# Altium PCB 后改2025底板线路板图.PcbDoc (part 1 of 4)
Units mm, origin at the board's own origin, x right, y up, seen from the top; angles counter-clockwise.
Board outline 200 x 230 mm, 4 copper layers (Top Layer, GND, POWER, Bottom Layer), stack 0.603 mm thick; 355 components, 331 nets, 1313 pads, 565 vias.
Unrouted connection lines stored in the file: 251.
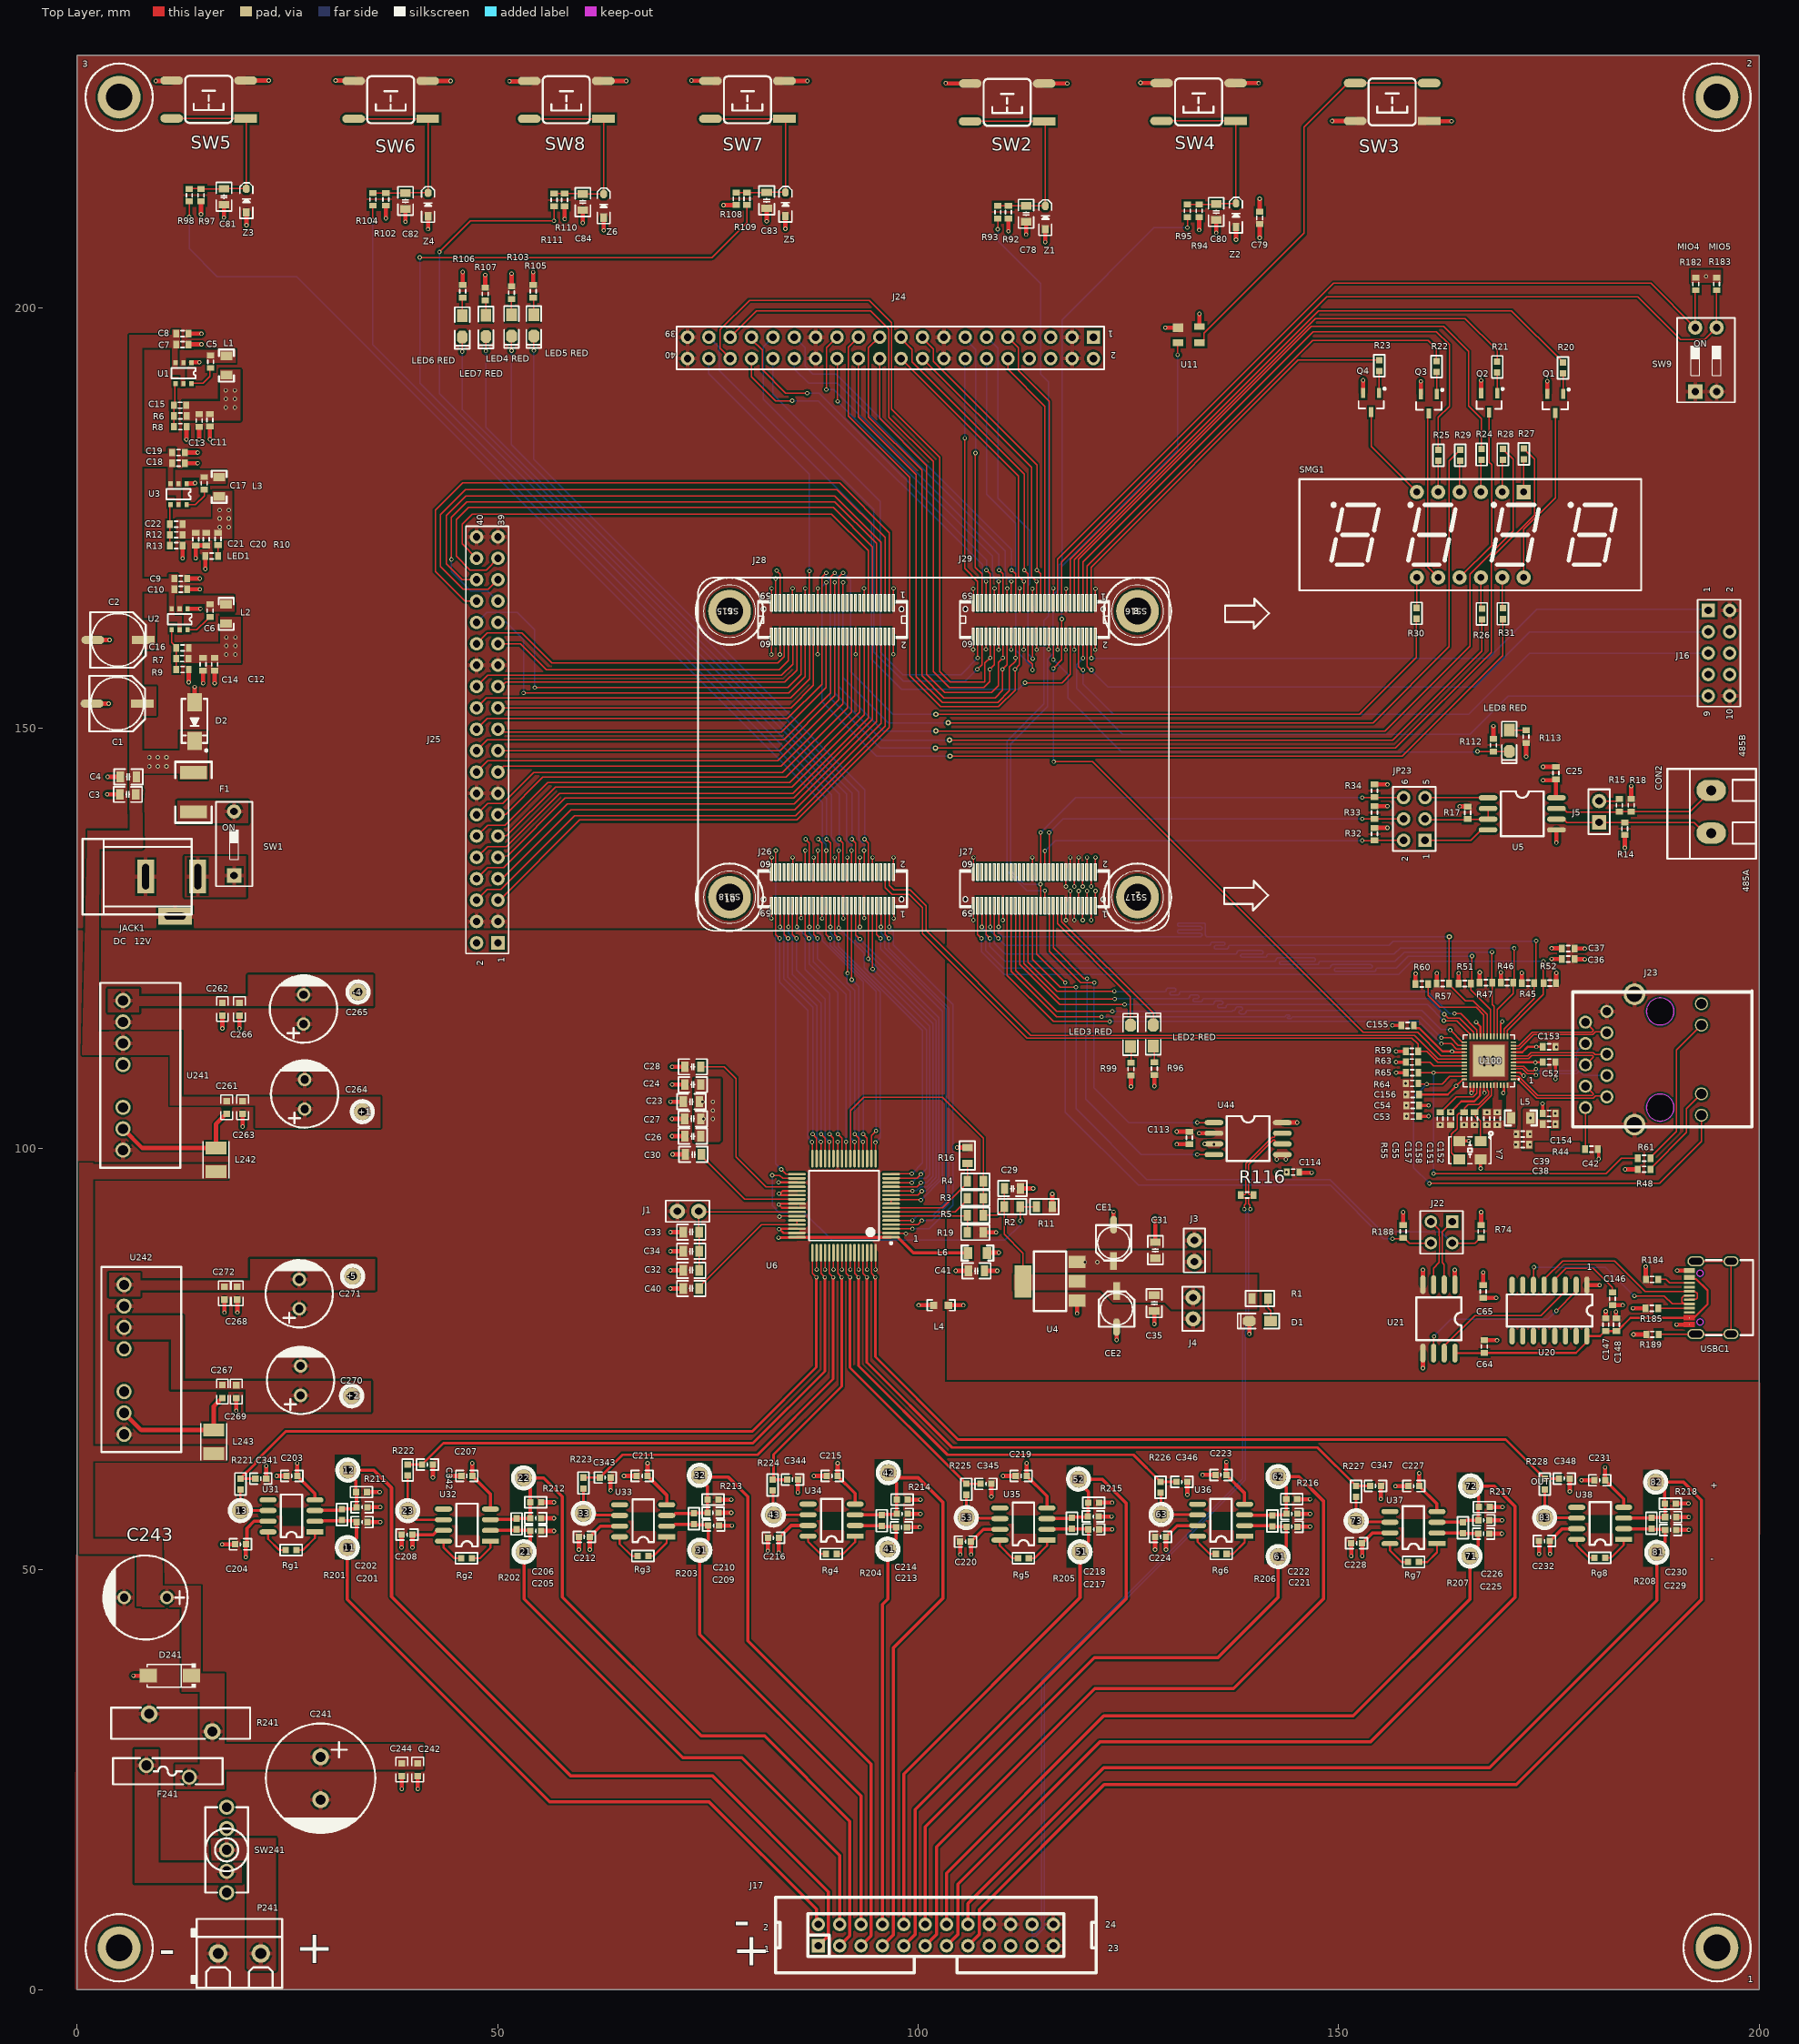
[diagram p0: Top Layer view]
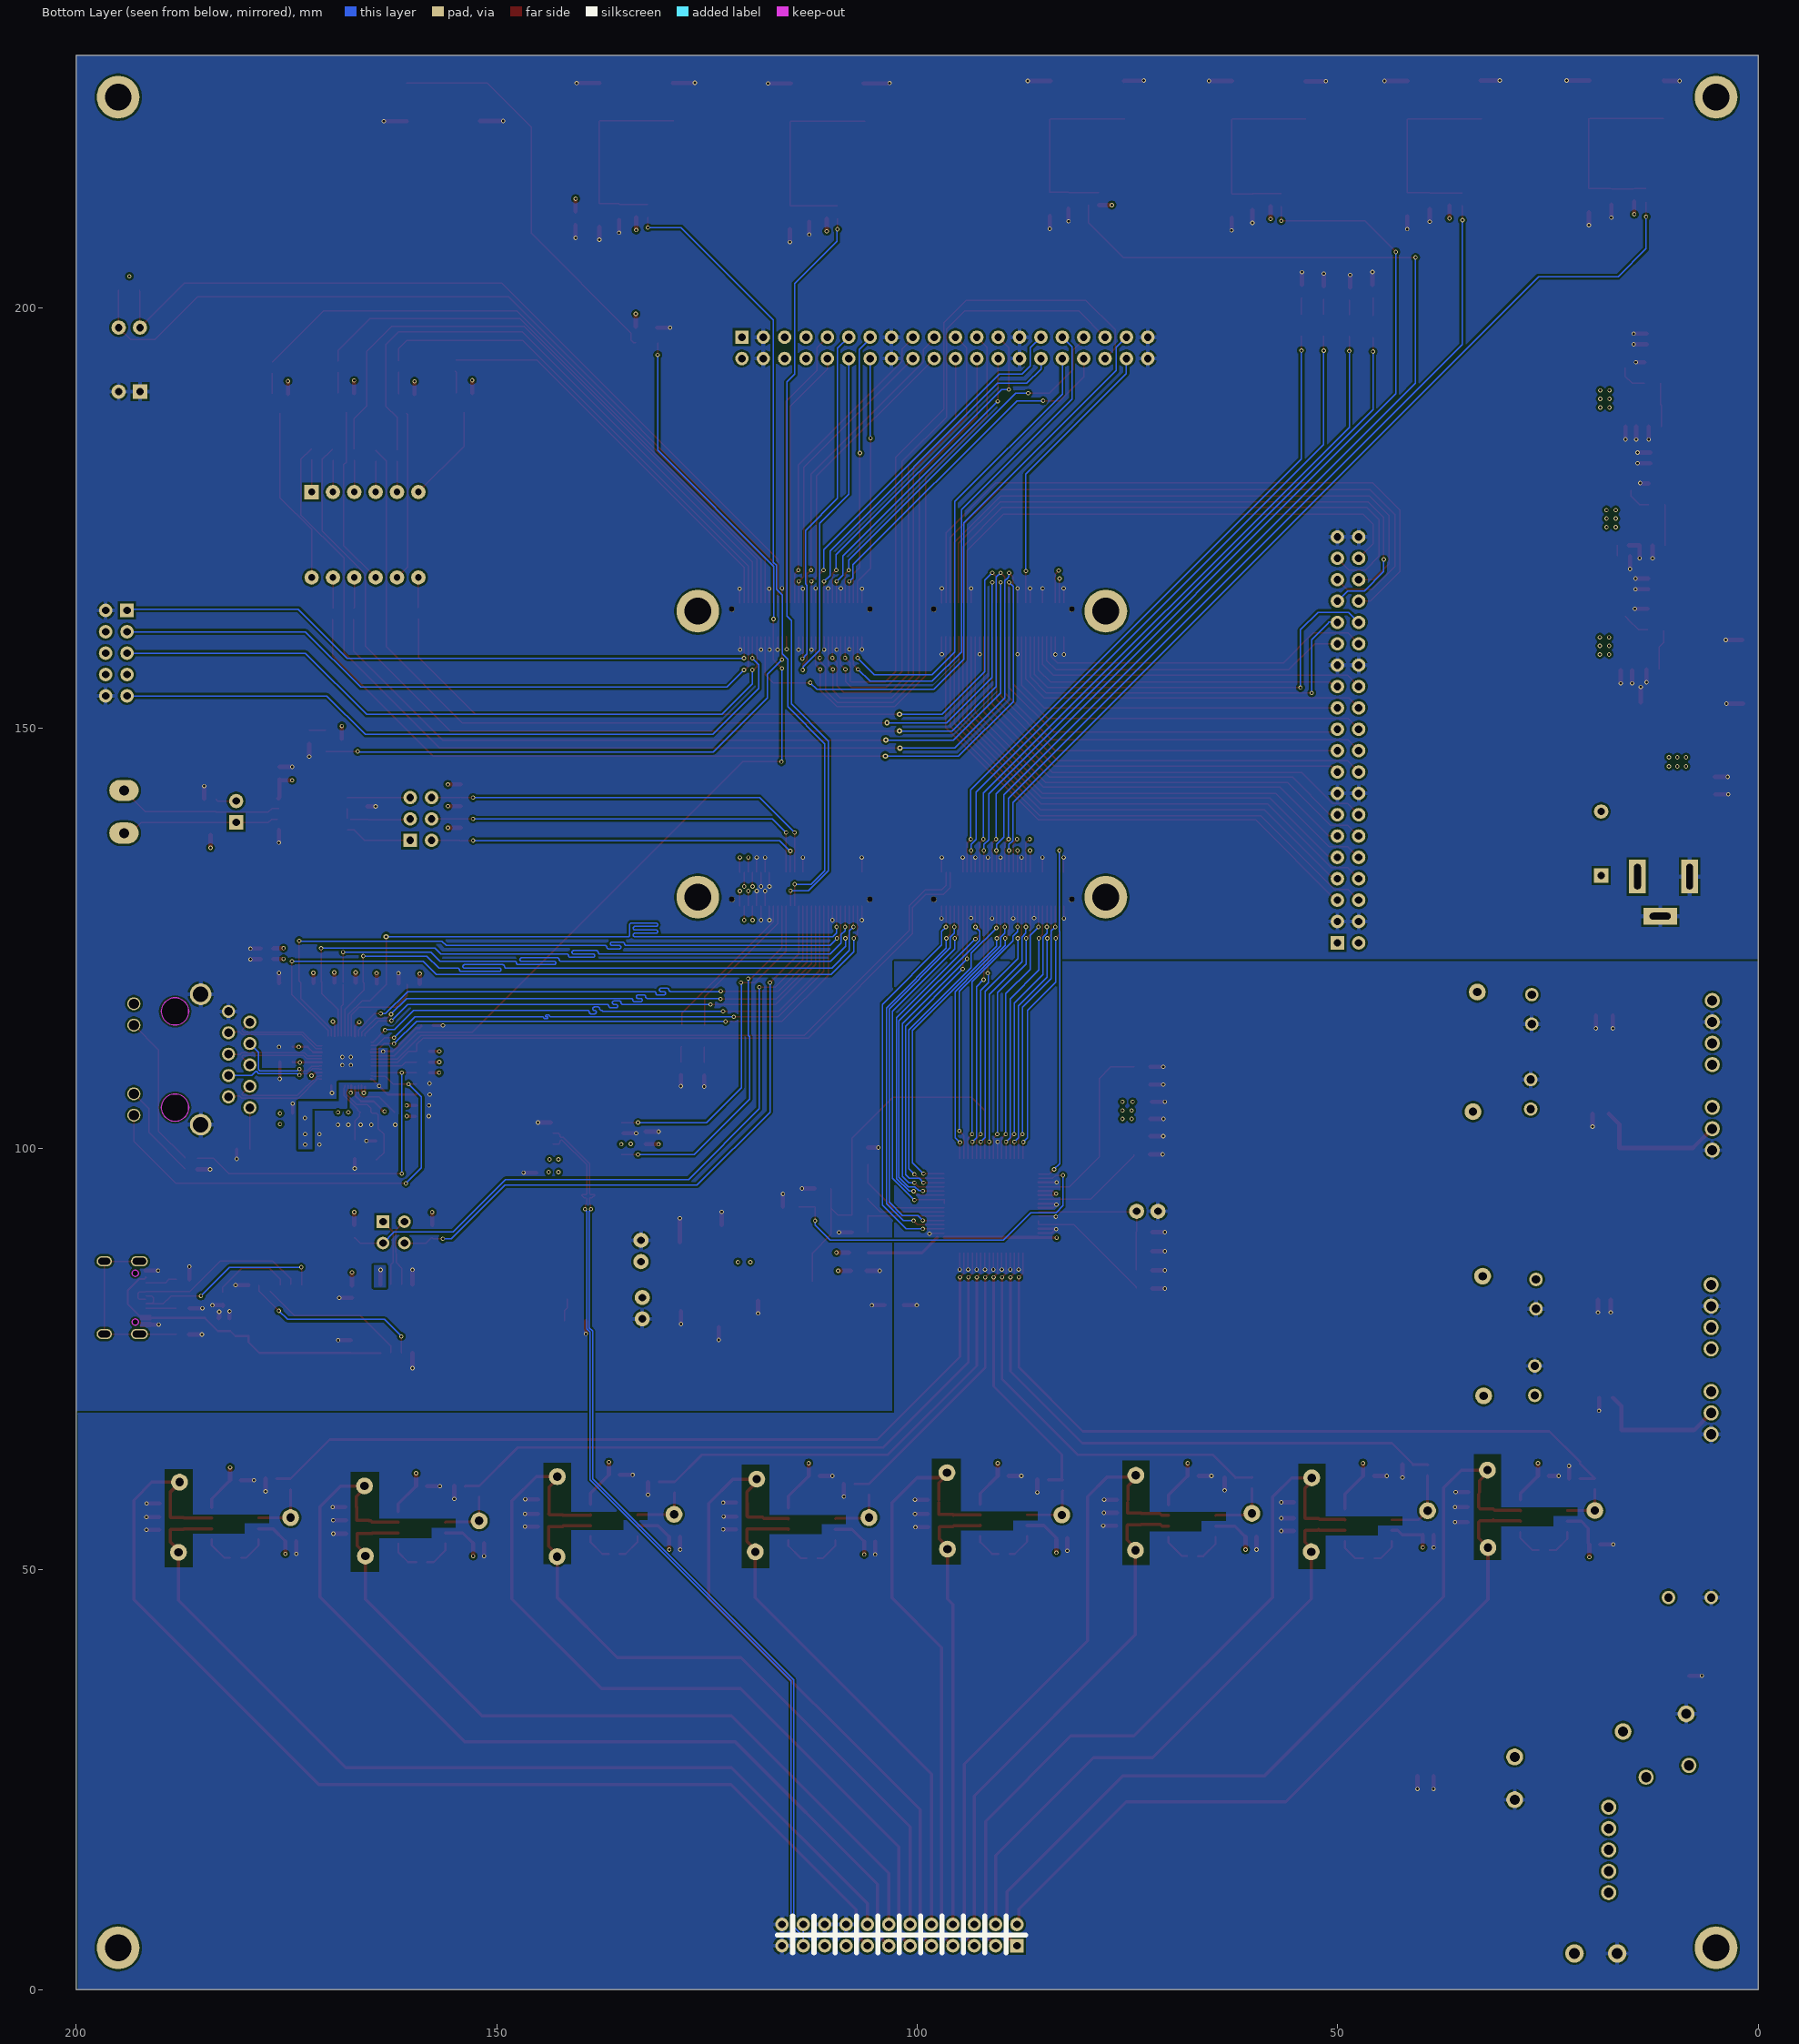
[diagram p1: Bottom Layer view, seen from below]
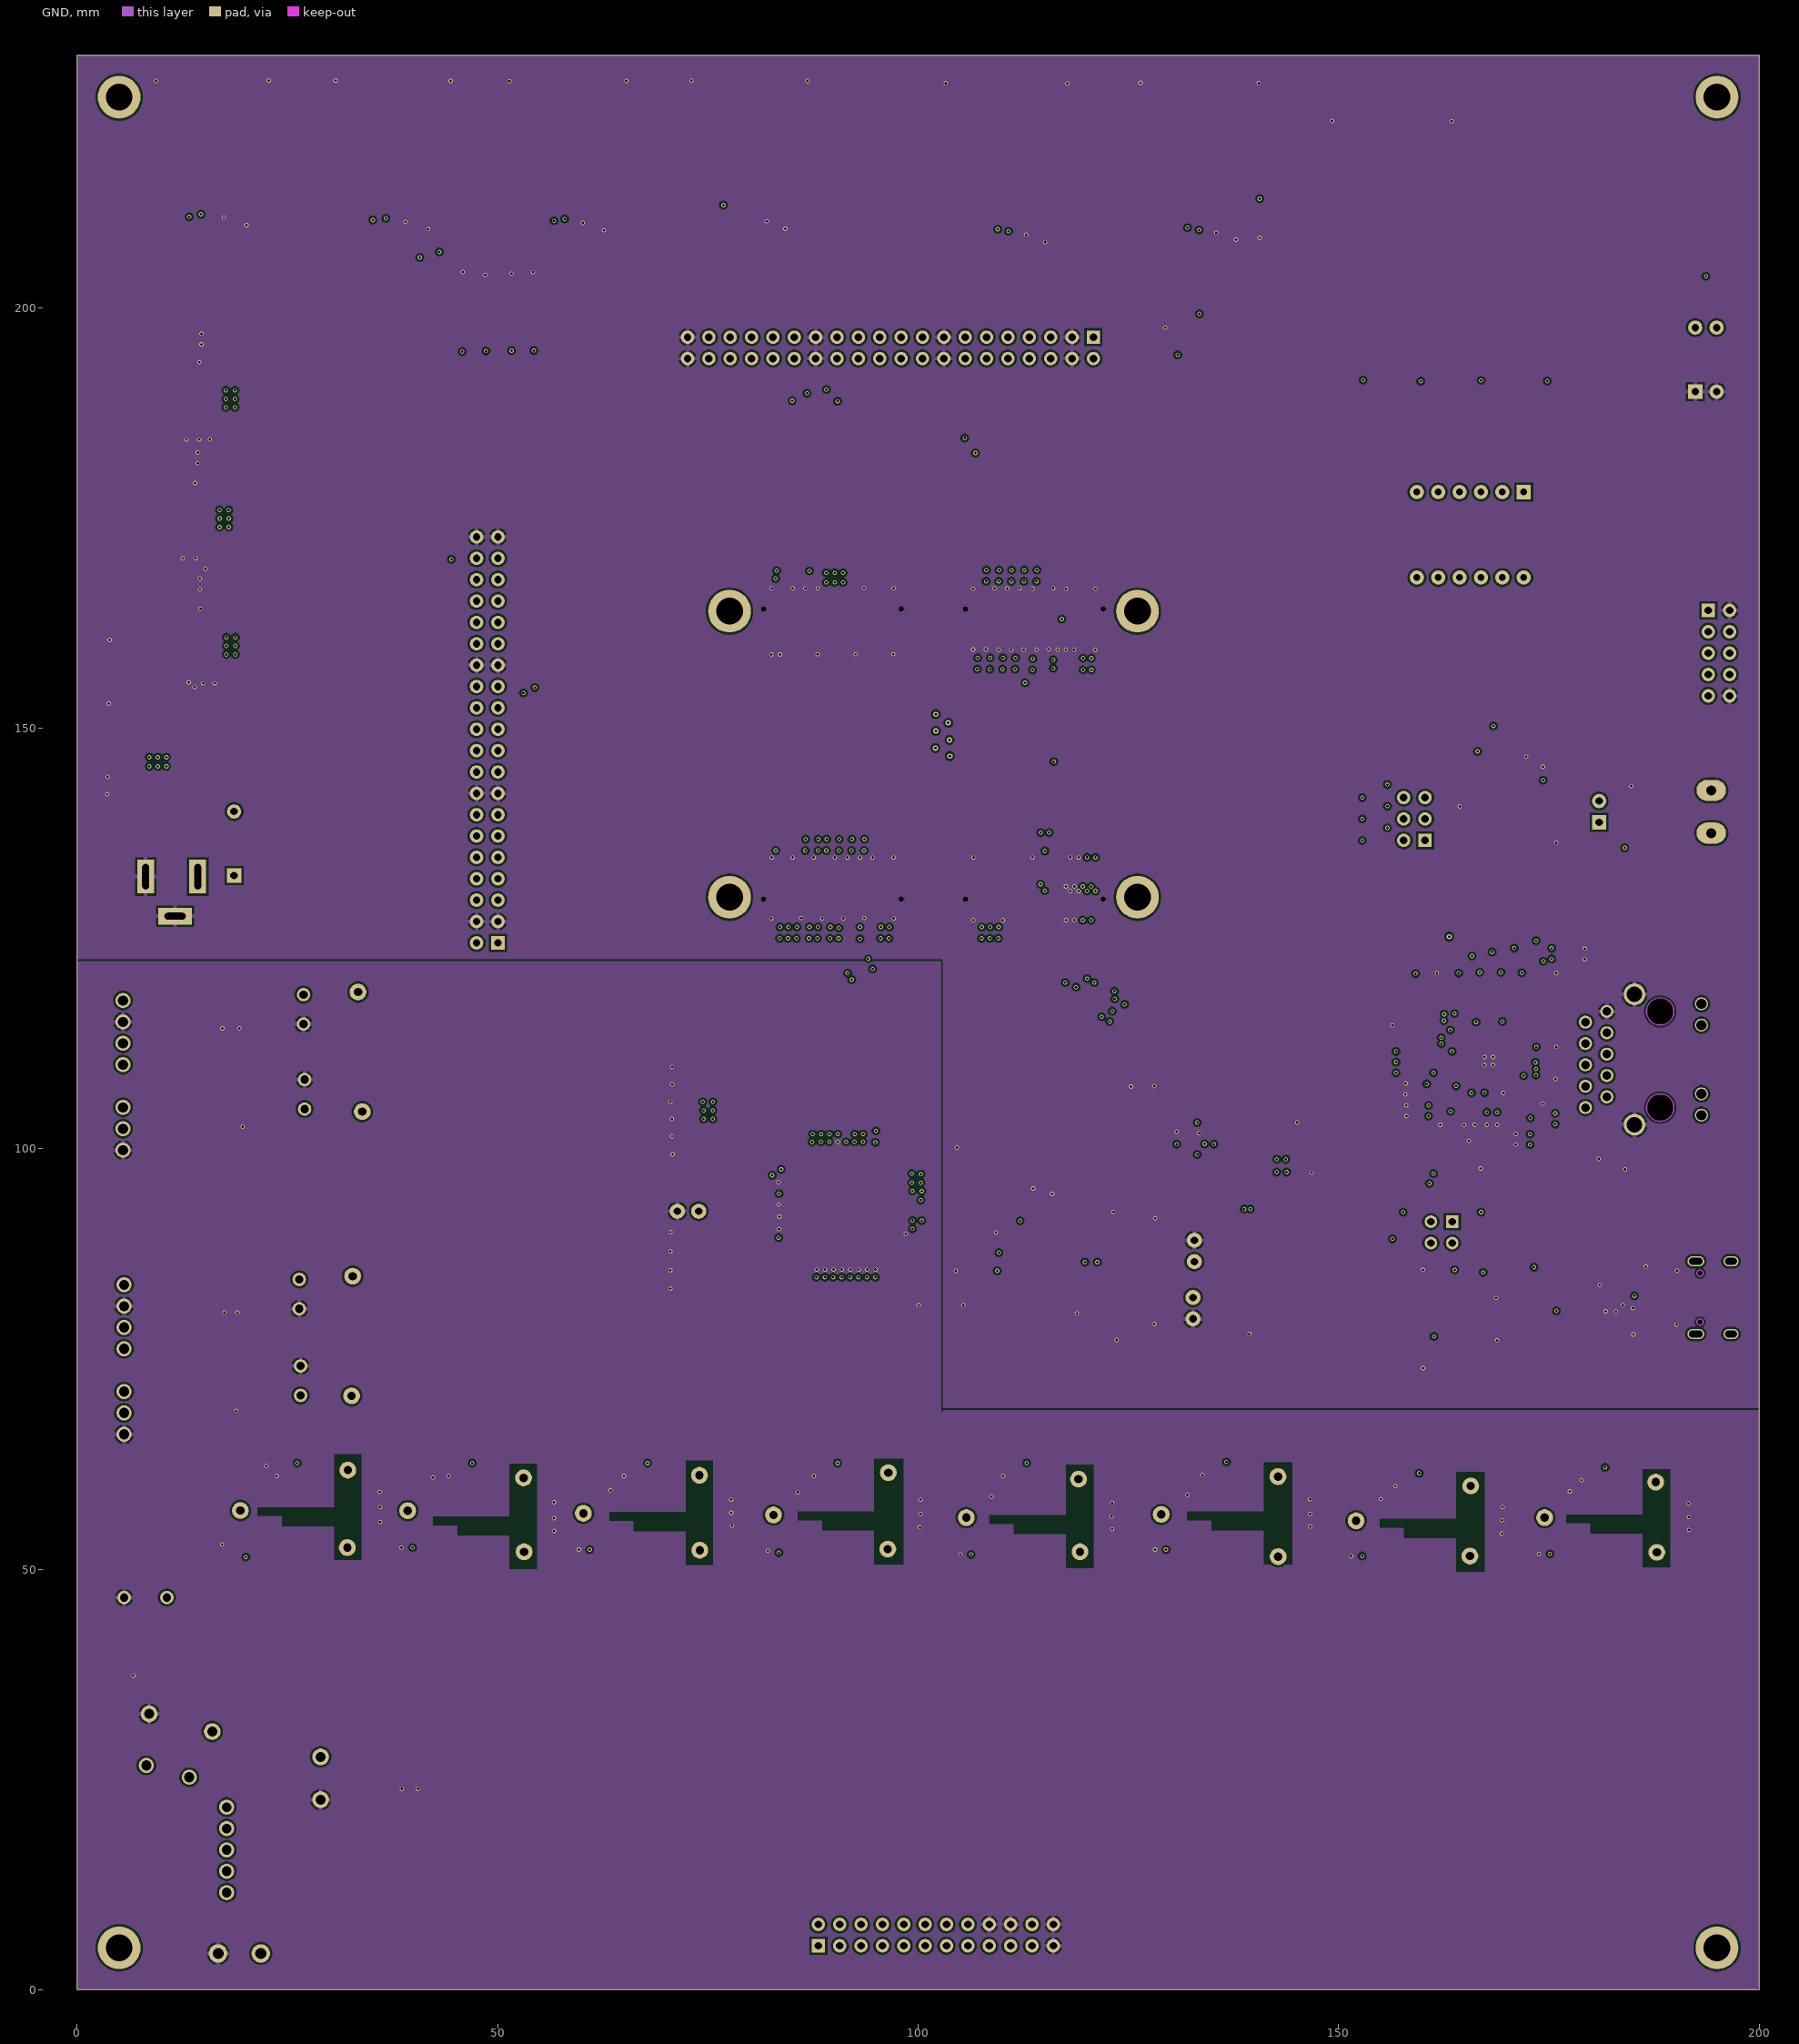
[diagram p2: GND]
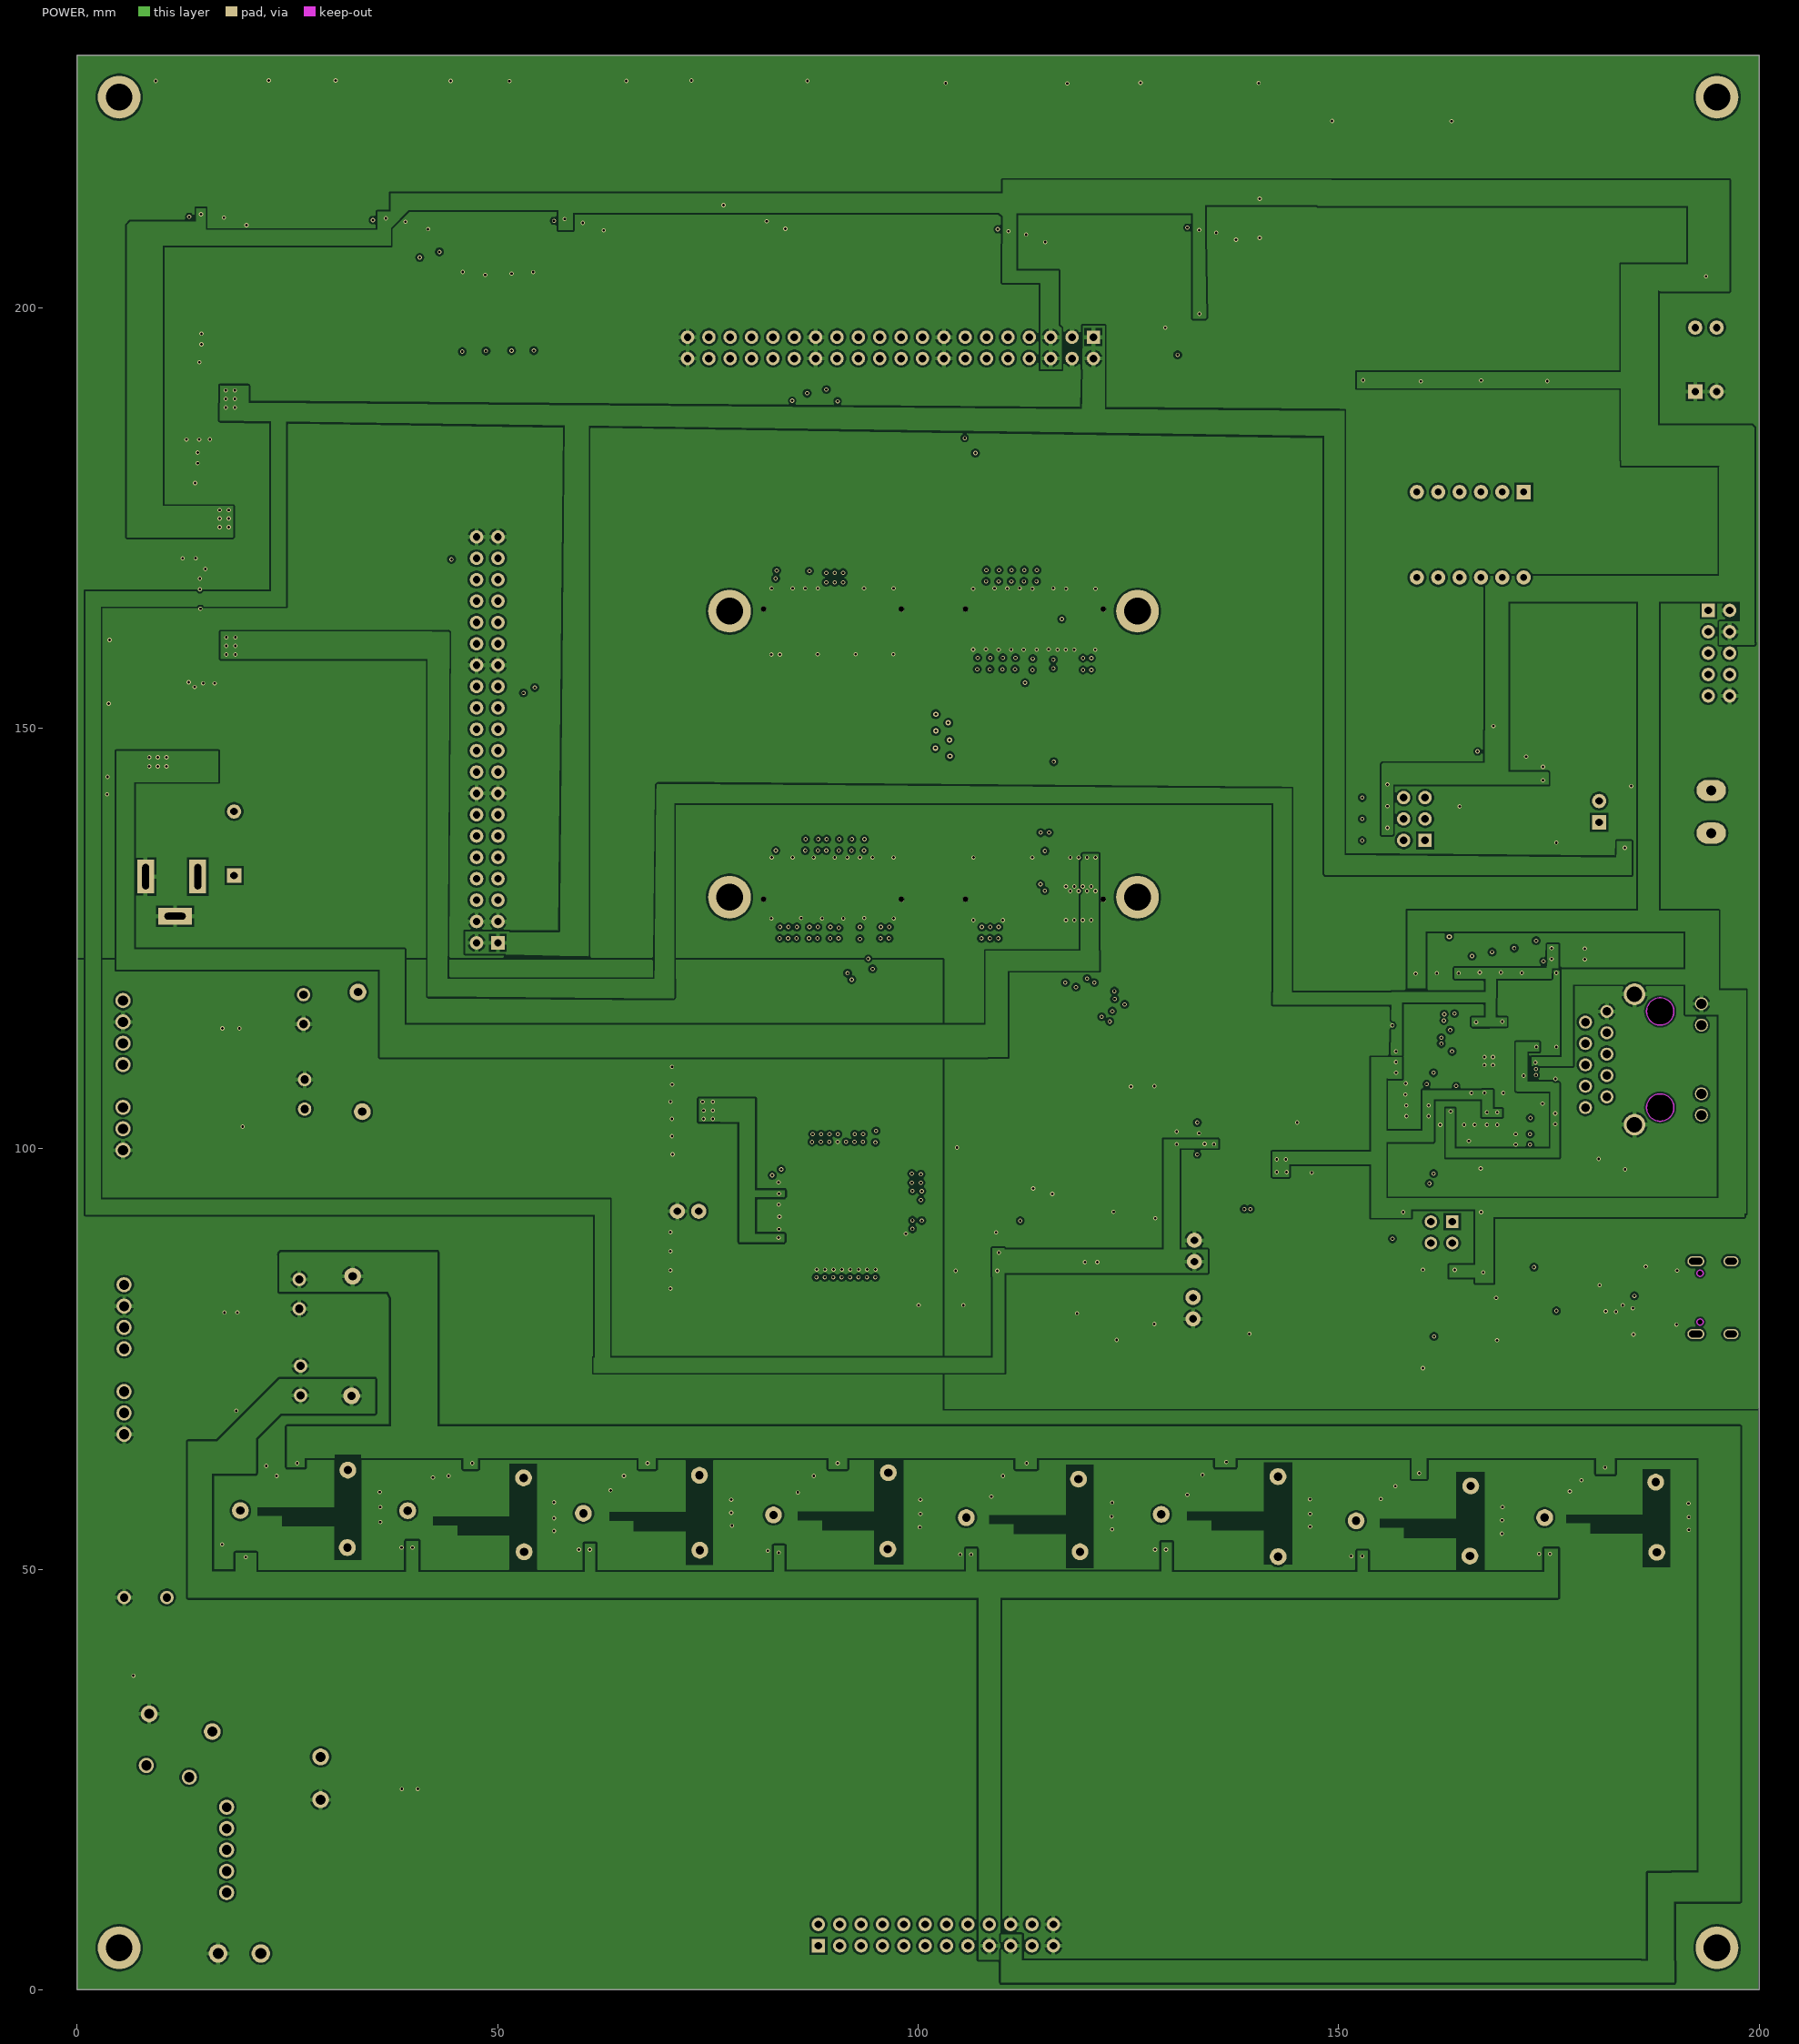
[diagram p3: POWER]

## Layer stack, top to bottom
Top Solder: solder mask 0.0102, Solder Resist, Dk 3.5
Top Layer: signal copper 0.0356
Dielectric 2: prepreg 0.0711, PP-006, Dk 4.1
GND: signal copper 0.035
Dielectric 1: dielectric 0.32, FR-4, Dk 4.8
POWER: signal copper 0.035
Dielectric 3: prepreg 0.0711, PP-006, Dk 4.1
Bottom Layer: signal copper 0.0356
Bottom Solder: solder mask 0.0102, Solder Resist, Dk 3.5

## Board outline
0,0 200,0 200,230 0,230

## Design rules (kind name [scope] priority, off if disabled: settings)
Clearance [All] p1: gap=0.254 ignorepadtopadclearanceinfootprint=TRUE except(0: Arc-Hole Track-Hole SMDPad-Hole THPad-Hole Via-Hole Fill-Hole Poly-Hole Region-Hole Text-Hole; 0.152: Arc-Arc Arc-Track Arc-SMDPad Arc-Via Track-Track Track-SMDPad Track-Via; 0.203: Arc-THPad Arc-Text Track-THPad Track-Text SMDPad-SMDPad SMDPad-THPad SMDPad-Via SMDPad-Text THPad-THPad THPad-Via THPad-Text Via-Via Via-Text Fill-Text Poly-Text Region-Text Text-Text)
ComponentClearance [All] p1: gap=0 collisioncheckmode=3 verticalgap=0 showdistances=FALSE
DiffPairsRouting DiffPair_DiffPairsRouting [InDifferentialPairClass('All Differential Pairs')] p1: maxlimit=0.254 minlimit=0.152 mostfreqgap=0.152 toplayer_minwidth=0.152 toplayer_maxwidth=0.381 toplayer_prefwidth=0.152 midlayer1_minwidth=0.152 midlayer1_maxwidth=0.381 midlayer1_prefwidth=0.152 midlayer2_minwidth=0.152 midlayer2_maxwidth=0.381 midlayer2_prefwidth=0.152 bottomlayer_minwidth=0.152 bottomlayer_maxwidth=0.381 bottomlayer_prefwidth=0.152 maxuncoupledlength=12.7
DiffPairsRouting [All] p2: maxlimit=0.254 minlimit=0.152 mostfreqgap=0.152 toplayer_minwidth=0.152 toplayer_maxwidth=0.381 toplayer_prefwidth=0.152 midlayer1_minwidth=0.152 midlayer1_maxwidth=0.381 midlayer1_prefwidth=0.152 midlayer2_minwidth=0.152 midlayer2_maxwidth=0.381 midlayer2_prefwidth=0.152 bottomlayer_minwidth=0.152 bottomlayer_maxwidth=0.381 bottomlayer_prefwidth=0.152 maxuncoupledlength=12.7
HoleToHoleClearance [All] p1: gap=0 allowstackedmicrovias=TRUE
Length Length_1 [InNetClass('PS-ETH-TX')] p1: maxlimit=67.183 minlimit=66.167
Length [InNetClass('PS-ETH-RX')] p2: maxlimit=86.614 minlimit=85.598
MatchedLengths DiffPair_MatchedLengths [InDifferentialPairClass('New Class')] p1: tolerance=0.254 checknetsindiffpair=FALSE checkdiffpairvsdiffpair=TRUE checkxsignals=TRUE checkothers=TRUE
MatchedLengths [InNetClass('AD')] p2: tolerance=0.254 checknetsindiffpair=FALSE checkdiffpairvsdiffpair=TRUE checkxsignals=TRUE checkothers=TRUE
MinimumSolderMaskSliver [All] p1: minsoldermaskwidth=0
NetAntennae [All] p1: netantennaetolerance=0.051
PlaneClearance [All] p1: clearance=0.254
PlaneConnect [All] p1: planeconnectstyle=Relief reliefexpansion=0.508 reliefentries=4 reliefconductorwidth=0.508 reliefairgap=0.254
PolygonConnect [All] p1: thpad.connectstyle=Relief thpad.reliefconductorwidth=0.508 thpad.reliefentries=4 thpad.polygonreliefangle="90 Angle" thpad.airgapwidth=0.254 smdpad.connectstyle=Direct smdpad.reliefconductorwidth=0.254 smdpad.reliefentries=4 smdpad.polygonreliefangle="90 Angle" smdpad.airgapwidth=0.254 via.connectstyle=Direct via.reliefconductorwidth=0.254 via.reliefentries=4 via.polygonreliefangle="90 Angle" via.airgapwidth=0.254
RoutingVias [All] p1: holewidth=0.305 width=0.635 viastyle="Through Hole" minholewidth=0.254 minwidth=0.508 maxholewidth=0.381 maxwidth=0.762
SilkToSilkClearance [All] p1: silktosilkclearance=0
SilkToSolderMaskClearance [IsPad] p1: minsilkscreentomaskgap=0 clearancetoexposedcopper=TRUE
SolderMaskExpansion [All] p1: expansion=0.102 istentingtop=TRUE
SupplyNets "Schematic Supply Nets_12" [InNet('+12V')] p1: voltage=0.000
SupplyNets "Schematic Supply Nets_11" [InNet('-15V')] p2: voltage=0.000
SupplyNets "Schematic Supply Nets_10" [InNet('5V_USB')] p3: voltage=0.000
SupplyNets "Schematic Supply Nets_9" [InNet('AGND')] p4: voltage=0.000
SupplyNets "Schematic Supply Nets_8" [InNet('ADVDD10_PS')] p5: voltage=0.000
SupplyNets "Schematic Supply Nets_7" [InNet('+15V')] p6: voltage=0.000
SupplyNets "Schematic Supply Nets_6" [InNet('1V8')] p7: voltage=0.000
SupplyNets "Schematic Supply Nets_5" [InNet('+5')] p8: voltage=0.000
SupplyNets "Schematic Supply Nets_4" [InNet('GND')] p9: voltage=0.000
SupplyNets "Schematic Supply Nets_3" [InNet('AVCC')] p10: voltage=0.000
SupplyNets "Schematic Supply Nets_2" [InNet('3V3')] p11: voltage=0.000
SupplyNets "Schematic Supply Nets_1" [InNet('VDRIVE')] p12: voltage=0.000
SupplyNets "Schematic Supply Nets" [InNet('DVDD10_PS')] p13: voltage=0.000
UnRoutedNet [All] p1: checkbadconnections=TRUE
Width POWER [InNetClass('POWER')] p1: maxlimit=1.524 minlimit=0.254 preferedwidth=0.762
Width [All] p2: maxlimit=0.381 minlimit=0.152 preferedwidth=0.152
20 further rules are at their usual default settings.

## Classes and differential pairs
net class PS_ETH_RX: A15 A16 B17 D11 D13 F15
net class PS_ETH_TX: A17 A19 B18 D10 E14 F14
differential pair class "New Class": NewDifferentialPair1 PS_0 PS_1 PS_2 PS_3
differential pair CAN: +CAN_P -CAN_N
differential pair PS_0: +PS_P0 -PS_N0
differential pair PS_3: +PS_P3 -PS_N3
differential pair PS_2: +PS_P2 -PS_N2
differential pair PS_1: +PS_P1 -PS_N1

## Components (designator, comment, footprint, x,y, rotation, side; value= is the part's Value field where it differs from the comment)
1 "Comment" M3x14_L 195,5 r180 top locked
2 "Comment" M3x14_L 195,225 r270 top locked
3 "Comment" M3x14_L 5,225 r0 top locked
7 "Comment" M3x14_L 126.082,129.889 r90 top locked
8 "Comment" M3x14_L 126.082,163.889 r90 top locked
9 "Comment" M3x14_L 77.574,163.889 r90 top locked
10 "Comment" M3x14_L 77.574,129.889 r90 top
11 "TEST POINT" TEST 32.131,52.578 r0 top
12 "TEST POINT" TEST 32.194,61.783 r0 top
13 "TEST POINT" TEST 19.416,56.974 r0 top
21 "TEST POINT" TEST 53.149,52.07 r0 top
22 "TEST POINT" TEST 53.086,60.858 r0 top
23 "TEST POINT" TEST 39.306,56.959 r0 top
31 "TEST POINT" TEST 74.041,52.261 r180 top
32 "TEST POINT" TEST 73.998,61.163 r180 top
33 "TEST POINT" TEST 60.198,56.642 r180 top
41 "TEST POINT" TEST 96.393,52.387 r0 top
42 "TEST POINT" TEST 96.456,61.475 r0 top
43 "TEST POINT" TEST 82.804,56.451 r0 top
51 "TEST POINT" TEST 119.253,52.07 r0 top
52 "TEST POINT" TEST 119.075,60.706 r0 top
53 "TEST POINT" TEST 105.727,56.134 r0 top
61 "TEST POINT" TEST 142.811,51.498 r180 top
62 "TEST POINT" TEST 142.789,61.011 r180 top
63 "TEST POINT" TEST 128.905,56.515 r180 top
71 "TEST POINT" TEST 165.608,51.562 r0 top
72 "TEST POINT" TEST 165.71,59.893 r0 top
73 "TEST POINT" TEST 152.082,55.753 r0 top
81 "TEST POINT" TEST 187.833,52.006 r0 top
82 "TEST POINT" TEST 187.706,60.35 r0 top
83 "TEST POINT" TEST 174.498,56.134 r0 top
+1 "TEST POINT" TEST 33.909,104.394 r90 top
+2 "TEST POINT" TEST 32.639,70.612 r0 top
-4 "TEST POINT" TEST 33.401,118.618 r90 top
-5 "TEST POINT" TEST 32.766,84.836 r0 top
C1 "100uF/10V" "CM D(6.3*5.4)" 4.775,152.908 r0 top
C2 "NC CAP100" "CM D(6.3*5.4)" 4.874,160.477 r0 top
C3 "10uF" "C 0805_L" 6.035,142.113 r0 top
C4 "0.1uF" "C 0805_L" 6.096,144.2 r0 top
C5 "0.1uF" 0603 15.875,193.56 r270 top
C6 "0.1uF" 0603 15.811,163.969 r270 top
C7 "10uF" 0603 12.519,195.611 r180 top
C8 "0.1uF" 0603 12.519,196.881 r180 top
C9 "10uF" 0603 12.319,167.767 r180 top
C10 "0.1uF" 0603 12.319,166.497 r180 top
C11 "22uF" 0603 15.781,186.594 r90 top
C12 "22uF" 0603 16.352,157.598 r90 top
C13 "0.1uF" 0603 14.511,186.582 r90 top
C14 "0.1uF" 0603 14.986,157.595 r90 top
C15 "NC C0603" 0603 12.246,188.372 r180 top
C16 "NC C0603" 0603 12.522,159.534 r180 top
C17 "0.1uF" 0603 15.113,179.082 r270 top
C18 "10uF" 0603 12.065,181.483 r180 top
C19 "0.1uF" 0603 12.065,182.753 r180 top
C20 "22uF" 0603 15.367,172.466 r90 top
C21 "0.1uF" 0603 14.097,172.466 r90 top
C22 "NC C0603" 0603 11.799,174.244 r180 top
C23 "0.1uF" "C 0805_L" 73.032,105.579 r0 top
C24 "0.1uF" "C 0805_L" 73.219,107.611 r0 top
C25 "0.1uF" 0603 175.831,144.64 r270 top
C26 "0.1uF" "C 0805_L" 73.213,101.473 r0 top
C27 "0.1uF" "C 0805_L" 73.195,103.547 r0 top
C28 "1uF" "C 0805_L" 73.213,109.728 r180 top
C29 "0.1uF" "C 0805_L" 111.218,95.258 r180 top
C30 "1uF" "C 0805_L" 73.279,99.314 r180 top
C31 "0.1uF" "C 0805_L" 128.207,87.925 r270 top
C32 "10uF" "C 0805_L" 73.025,85.534 r0 top
C33 "0.1uF" "C 0805_L" 73.025,90.081 r0 top
C34 "10uF" "C 0805_L" 73.025,87.795 r0 top
C35 "0.1uF" "C 0805_L" 128.079,81.63 r90 top
C36 "0.1uF" 0603 177.304,122.53 r180 top
C37 "0.1uF" 0603 177.304,123.8 r180 top
C38 "0.1uF" 0603 171.914,100.477 r0 top
C39 "22uF" 0603 171.914,101.727 r0 top
C40 "10uF" "C 0805_L" 73.025,83.376 r0 top
C41 "10uf" "C 0805_L" 106.934,85.471 r0 top
C42 "0.1uF" 0603 180.057,99.924 r180 top
C52 "0.1uF" 0603 175.037,110.305 r180 top
C53 "0.1uF" 0603 158.813,103.858 r0 top
C54 "0.1uF" 0603 158.801,105.128 r0 top
C55 "0.1uF" 0603 163.321,103.578 r90 top
C64 "0.1uF" 0603 167.322,76.466 r270 top
C65 "0.1uF" 0603 167.195,83.007 r270 top
C78 "0.1uF" "C 0805_L" 112.839,211.14 r90 top
C79 "0.1uF" 0603 140.614,210.656 r90 top
C80 "0.1uF" "C 0805_L" 135.445,211.359 r90 top
C81 "0.1uF" "C 0805_L" 17.462,213.161 r90 top
C82 "0.1uF" "C 0805_L" 39.044,212.661 r90 top
C83 "0.1uF" "C 0805_L" 81.997,212.726 r90 top
C84 "0.1uF" "C 0805_L" 60.134,212.534 r90 top
C113 "0.1uF" 0603 132.267,101.27 r270 top
C114 "0.1uF" 0603 144.565,97.206 r180 top
C146 "0.1uF" 0603 182.562,82.169 r90 top
C147 "0.1uF" 0603 181.77,79.067 r90 top
C148 "0.1uF" 0603 183.04,79.067 r90 top
C151 "0.1uF" 0603 167.636,103.578 r90 top
C152 "10uF" 0603 168.865,103.578 r90 top
C153 "0.1uF" 0603 175.037,112.091 r180 top
C154 "0.1uF" 0603 175.01,104.191 r0 top
C155 "0.1uF" 0603 158.191,114.656 r0 top
C156 "0.1uF" 0603 158.801,106.426 r0 top
C157 "18pF" 0603 164.913,103.578 r90 top
C158 "18pF" 0603 166.171,103.578 r90 top
C201 "104" "C 0603_L" 33.876,55.602 r0 top
C202 "104" "C 0603_L" 33.875,57.38 r180 top
C203 "104" "C 0603_L" 25.527,61.087 r0 top
C204 "104" "C 0603_L" 19.416,52.959 r180 top
C205 "104" "C 0603_L" 54.532,54.547 r0 top
C206 "104" "C 0603_L" 54.531,56.07 r180 top
C207 "104" "C 0603_L" 46.34,61.087 r0 top
C208 "104" "C 0603_L" 39.228,54.102 r180 top
C209 "104" "C 0603_L" 75.692,55.181 r0 top
C210 "104" "C 0603_L" 75.613,56.705 r180 top
C211 "104" "C 0603_L" 67.183,61.087 r0 top
C212 "104" "C 0603_L" 60.31,53.848 r180 top
C213 "104" "C 0603_L" 98.029,54.991 r0 top
C214 "104" "C 0603_L" 98.092,56.578 r180 top
C215 "104" "C 0603_L" 89.774,61.087 r0 top
C216 "104" "C 0603_L" 82.789,53.721 r180 top
C217 "104" "C 0603_L" 120.889,54.737 r0 top
C218 "104" "C 0603_L" 120.84,56.261 r180 top
C219 "104" "C 0603_L" 112.253,61.087 r0 top
C220 "104" "C 0603_L" 105.649,53.276 r180 top
C221 "104" "C 0603_L" 144.448,55.055 r0 top
C222 "104" "C 0603_L" 144.447,56.578 r180 top
C223 "104" "C 0603_L" 136.002,61.214 r0 top
C224 "104" "C 0603_L" 128.826,53.848 r180 top
C225 "104" "C 0603_L" 167.244,54.229 r0 top
C226 "104" "C 0603_L" 167.259,55.816 r180 top
C227 "104" "C 0603_L" 158.926,59.881 r0 top
C228 "104" "C 0603_L" 152.146,53.086 r180 top
C229 "104" "C 0603_L" 189.469,54.674 r0 top
C230 "104" "C 0603_L" 189.469,56.197 r180 top
C231 "104" "C 0603_L" 181.038,60.579 r0 top
C232 "104" "C 0603_L" 174.483,53.34 r180 top
C241 "680uF" CAP-TH_BD13.0-P5.00-D1.2-FD 28.956,25.146 r270 top
C242 "4.7uf" 0603C 40.513,26.162 r270 top
C243 "330uf" CAP-TH_BD10.0-P5.00-D1.0-FD 8.128,46.634 r180 top
C244 "10uf" 0603C 38.608,26.162 r270 top
C261 "1nf" 0603C 17.78,104.902 r90 top
C262 "1nf" 0603C 17.272,116.584 r90 top
C263 "10uf" 0603C 19.685,104.904 r270 top
C264 "100uF" CAP-TH_BD8.0-P3.50-D0.6-FD 27.051,106.454 r90 top
C265 "100uF" CAP-TH_BD8.0-P3.50-D0.6-FD 26.924,116.558 r90 top
C266 "10uf" 0603C 19.304,116.586 r270 top
C267 "1nf" 0603C 17.272,71.122 r90 top
C268 "1nf" 0603C 19.05,82.802 r90 top
C269 "10uf" 0603C 18.923,71.118 r270 top
C270 "100uF" CAP-TH_BD8.0-P3.50-D0.6-FD 26.568,72.413 r90 top
C271 "100uF" CAP-TH_BD8.0-P3.50-D0.6-FD 26.416,82.705 r90 top
C272 "10uf" 0603C 17.526,82.802 r270 top
C341 "104" "C 0603_L" 21.844,60.757 r180 top
C342 "104" "C 0603_L" 41.656,62.433 r180 top
C343 "104" "C 0603_L" 62.789,60.899 r180 top
C344 "104" "C 0603_L" 85.057,60.655 r180 top
C345 "104" "C 0603_L" 108.062,60.147 r180 top
C346 "104" "C 0603_L" 131.359,60.373 r180 top
C347 "104" "C 0603_L" 154.381,59.893 r180 top
C348 "104" "C 0603_L" 176.835,60.779 r180 top
CE1 "10uF/16V" "CM B(4*5.4)" 123.241,88.798 r270 top
CE2 "10uF/16V" "CM B(4*5.4)" 123.596,80.924 r90 top
CON2 "HDR-1X2" KF128-5.08-2P 194.31,140.056 r90 top
D1 "LED" "LED 0805R" 140.653,79.502 r180 top
D2 "SMAJ13CA" SMA 13.97,150.763 r270 top
D241 "SS34" SMA_L4.4-W2.8-LS5.4-RD 11.024,37.338 r180 top
F1 "JK-MSMD150-24V" 1812 13.843,142.367 r90 top
F241 "TRB300" FUSE-TH_L13.0-W3.1-P5.10-D0.8-S1.40 10.785,25.973 r0 top
J1 "2.5V" 2pin 72.644,92.558 r270 top
J3 "5V" 2pin 132.842,87.833 r180 top
J4 "3.3V" 2pin 132.69,81.026 r0 top
J5 "1X2PIN" HDR2.54-Y-LI-2P 180.975,140.056 r90 top
J16 "JTAG_5x2_2P54_R" HDR2.54-LI-2x5P 195.224,158.902 r270 top
J17 "Header 2X11" IDC2.54-LI-2x12P 88.138,5.232 r0 top
J22 "2X2PIN" HDR2X2_B 163.512,91.313 r270 top
J23 "HY911130A" RJ45-TH_10P-P2.54-S2.54_L16.1-W21.4_HY911130A 188.936,112.714 r90 top
J24 "2X20PIN" HDR2.54-LI-2x20P 96.71,195.199 r180 top
J25 "2X20PIN" HDR2.54-LI-2x20P 48.768,148.59 r90 top
J26 "SGDBF-05-60P-H30" CONN-SMD_60P-P0.50_SGDBF-05-60P_1 80.978,128.689 r0 top
J27 "SGDBF-05-60P-H30" CONN-SMD_60P-P0.50_SGDBF-05-60P_1 104.978,128.689 r0 top
J28 "SGDBM-05-60P-H10" CONN-SMD_60P-P0.50_SGDBM-05-60P_1 80.965,165.089 r0 top
J29 "SGDBM-05-60P-H10" CONN-SMD_60P-P0.50_SGDBM-05-60P_1 104.965,165.089 r0 top
JACK1 "POWER JACK" DC-005 8.151,132.334 r180 top
JP23 "Header3X2" HDR2.54-LI-2x3P 159.004,139.192 r90 top
L1 "3.3uH" "L 0805" 17.749,193.094 r270 top
L2 "3.3uH" "L 0805" 17.729,163.567 r270 top
L3 "3.3uH" "L 0805" 16.891,178.689 r270 top
L4 "10uH" "L 0603" 102.718,81.382 r0 top
L5 "2.2uH" "L 0805" 171.66,103.641 r0 top
L6 "10uH" "L 0805" 107.061,87.58 r0 top
L242 "4.7uH" 1210L 16.51,98.676 r90 top value="15uH   0.6A"
L243 "4.7uH" 1210L 16.256,65.148 r90 top value="15uH   0.6A"
LED1 "LED" 0603 15.99,170.434 r180 top
"LED2 RED" "LED" "LED 0805R" 127.96,113.436 r90 top
"LED3 RED" "LED" "LED 0805R" 125.247,113.386 r90 top
"LED4 RED" "LED" "LED 0805R" 51.656,197.859 r270 top
"LED5 RED" "LED" "LED 0805R" 54.305,197.866 r270 top
"LED6 RED" "LED" "LED 0805R" 45.796,197.744 r270 top
"LED7 RED" "LED" "LED 0805R" 48.616,197.815 r270 top
"LED8 RED" "LED" "LED 0805R" 170.29,148.488 r270 top
P241 "电源" CONN-TH_2P-P5.08 19.304,4.318 r0 top
Q1 "S9015" SOT23-3N 175.76,188.585 r180 top
Q2 "S9015" SOT23-3N 167.894,188.661 r180 top
Q3 "S9015" SOT23-3N 160.723,188.554 r180 top
Q4 "S9015" SOT23-3N 153.865,188.686 r180 top
R1 "1K" "R 0805_L" 140.653,82.169 r0 top
R2 "1K" "R 0805_L" 111.188,93.099 r180 top
R3 "1K" "R 0805_L" 106.807,94.107 r0 top
R4 "NC" "R 0805_L" 106.807,96.139 r0 top
R5 "NC" "R 0805_L" 106.807,92.075 r0 top
R6 "115K" 0603 12.258,187.102 r180 top
R7 "40.2K" 0603 12.51,158.264 r180 top
R8 "20K" 0603 12.258,185.832 r180 top
R9 "30K" 0603 12.522,156.963 r180 top
R10 "1K" 0603 16.764,172.478 r90 top
R11 "NC" "R 0805_L" 115.003,93.099 r180 top
R12 "100K" 0603 11.799,172.974 r180 top
R13 "30K" 0603 11.799,171.704 r180 top
R14 "4.7K" 0603 184.023,138.036 r270 top
R15 "120" 0603 183.388,140.806 r270 top
R16 "1K" "R 0805_L" 105.857,99.189 r270 top
R17 "10K" 0603 165.354,139.929 r270 top
R18 "4.7K" 0603 184.785,140.83 r90 top
R19 "1K" "R 0805_L" 106.807,90.043 r180 top
R20 "4.7K" "R 0603_L" 176.682,192.826 r270 top
R21 "4.7K" "R 0603_L" 168.859,192.938 r270 top
R22 "4.7K" "R 0603_L" 161.646,192.989 r270 top
R23 "4.7K" "R 0603_L" 154.838,193.091 r270 top
R24 "470" "R 0603_L" 166.98,182.514 r90 top
R25 "470" "R 0603_L" 161.849,182.412 r90 top
R26 "470" "R 0603_L" 167.03,163.576 r270 top
R27 "470" "R 0603_L" 172.009,182.586 r90 top
R28 "470" "R 0603_L" 169.52,182.514 r90 top
R29 "470" "R 0603_L" 164.44,182.412 r90 top
R30 "470" "R 0603_L" 159.258,163.637 r270 top
R31 "470" "R 0603_L" 169.52,163.586 r270 top
R32 "10K" 0603 154.28,137.39 r90 top
R33 "10K" 0603 154.28,139.954 r90 top
R34 "10K" 0603 154.28,142.545 r90 top
R44 "0R" 0603 175.01,102.909 r180 top
R45 "4.7K" 0603 172.517,119.685 r180 top
R46 "4.7K" 0603 170.028,119.736 r180 top
R47 "4.7K" 0603 167.5,119.736 r180 top
R48 "510R" 0603 186.338,97.542 r0 top
R51 "4.7K" 0603 164.998,119.634 r180 top
R52 "4.7K" 0603 175.108,119.685 r180 top
R55 "2.49K" 0603 162.069,103.578 r270 top
R57 "4.7K" 0603 162.396,119.634 r0 top
R59 "1.5K" 0603 158.721,111.563 r180 top
R60 "4.7K" 0603 159.88,119.583 r180 top
R61 "510R" 0603 186.338,98.857 r0 top
R63 "4.7K" 0603 158.721,110.293 r180 top
R64 "4.7K" 0603 158.733,107.753 r180 top
R65 "4.7K" 0603 158.733,109.023 r180 top
R74 "10K" 0603 166.941,90.17 r90 top
R92 "4.7K" 0603 110.744,211.328 r270 top
R93 "1K" 0603 109.474,211.34 r270 top
R94 "4.7K" 0603 133.413,211.483 r270 top
R95 "1K" 0603 132.017,211.483 r270 top
R96 "470R" 0603 128.087,109.511 r90 top
R97 "4.7K" 0603 14.732,213.352 r270 top
R98 "1K" 0603 13.335,213.352 r270 top
R99 "470R" 0603 125.311,109.461 r90 top
R102 "4.7K" 0603 36.71,212.863 r270 top
R103 "470R" 0603 51.656,201.751 r270 top
R104 "1K" 0603 35.17,212.863 r270 top
R105 "470R" 0603 54.242,201.93 r270 top
R106 "470R" 0603 45.86,201.935 r270 top
R107 "470R" 0603 48.522,201.598 r270 top
R108 "4.7K" 0603 78.378,212.926 r270 top
R109 "1K" 0603 79.648,212.926 r270 top
R110 "4.7K" 0603 57.975,212.788 r270 top
R111 "1K" 0603 56.705,212.777 r270 top
R112 "330R" 0603 168.408,147.968 r90 top
R113 "1K" 0603 172.291,148.975 r90 top
R116 "120" 0603 139.129,94.489 r0 top
R182 "1K" 0603 192.468,202.807 r270 top
R183 "1K" 0603 194.945,202.807 r270 top
R184 "5.1K" 0603 187.274,84.455 r180 top
R185 "5.1K" 0603 187.261,81.026 r180 top
R188 "10K" 0603 157.671,90.17 r90 top
R189 "0R" 0603 187.325,77.915 r0 top
R201 "250Ω" "R 0603_L" 31.496,56.5 r90 top
R202 "250Ω" "R 0603_L" 52.26,55.387 r90 top
R203 "250Ω" "R 0603_L" 73.342,55.992 r90 top
R204 "250Ω" "R 0603_L" 95.694,55.768 r90 top
R205 "250Ω" "R 0603_L" 118.3,55.451 r90 top
R206 "250Ω" "R 0603_L" 142.113,55.753 r90 top
R207 "250Ω" "R 0603_L" 164.782,54.927 r90 top
R208 "250Ω" "R 0603_L" 187.198,55.451 r90 top
R211 "0Ω" "R 0603_L" 33.799,59.173 r0 top
R212 "0Ω" "R 0603_L" 54.532,57.963 r0 top
R213 "0Ω" "R 0603_L" 75.601,58.268 r0 top
R214 "0Ω" "R 0603_L" 98.092,58.268 r0 top
R215 "0Ω" "R 0603_L" 120.889,57.912 r0 top
R216 "0Ω" "R 0603_L" 144.424,58.318 r0 top
R217 "0Ω" "R 0603_L" 167.32,57.389 r0 top
R218 "0Ω" "R 0603_L" 189.433,57.81 r0 top
R221 "0Ω" "R 0603_L" 19.416,60.137 r90 top
R222 "0Ω" "R 0603_L" 39.306,61.783 r90 top
R223 "0Ω" "R 0603_L" 60.198,60.249 r90 top
R224 "0Ω" "R 0603_L" 82.702,60.005 r90 top
R225 "0Ω" "R 0603_L" 105.727,59.497 r90 top
R226 "0Ω" "R 0603_L" 128.829,59.723 r90 top
R227 "0Ω" "R 0603_L" 152.082,59.23 r90 top
R228 "0Ω" "R 0603_L" 174.498,60.132 r90 top
R241 "14D560K_C317812" RES-TH_L16.5-W3.5-P7.50-D0.8-S2.10 12.319,31.75 r180 top
Rg1 "5.49K" "R 0603_L" 25.461,52.273 r180 top
Rg2 "5.49K" "R 0603_L" 46.289,51.308 r180 top
Rg3 "5.49K" "R 0603_L" 67.27,51.562 r180 top
Rg4 "5.49K" "R 0603_L" 89.672,51.816 r180 top
Rg5 "5.49K" "R 0603_L" 112.522,51.308 r180 top
Rg6 "5.49K" "R 0603_L" 136.042,51.816 r180 top
Rg7 "5.49K" "R 0603_L" 158.913,50.851 r180 top
Rg8 "5.49K" "R 0603_L" 181.051,51.359 r180 top
SMG1 "3941B" "SMG 0.39-4P_A" 165.659,172.974 r180 top
SW1 "SW-1P" "CSW DIP-1P" 18.669,136.271 r0 top
SW2 "SW_PB_ESW" "TSW SMD-6*6*4.3" 110.592,224.384 r180 top
SW3 "SW_PB_ESW" "TSW SMD-6*6*4.3" 156.362,224.434 r180 top
SW4 "SW4" "TSW SMD-6*6*4.3" 133.35,224.434 r180 top
SW5 "SW_PB_ESW" "TSW SMD-6*6*4.3" 15.646,224.739 r180 top
SW6 "SW_PB_ESW" "TSW SMD-6*6*4.3" 37.287,224.688 r180 top
SW7 "SW_PB_ESW" "TSW SMD-6*6*4.3" 79.705,224.688 r180 top
SW8 "SW_PB_ESW" "TSW SMD-6*6*4.3" 58.166,224.688 r180 top
SW9 "DSWB02LHGET" "CSW DIP-2P" 193.675,193.802 r0 top
SW241 "2MS1T2B2VS2QES" SW-TH_2MS1T2B2VS2QES 17.78,16.637 r180 top
U1 "TP6327GS6" SOT-23-6 13.599,193.446 r270 top
U2 "TP6327GS6" SOT-23-6 13.142,164.171 r270 top
U3 "TP6327GS6" SOT-23-6 13.015,179.07 r270 top
U4 "1117-3.3" SOT-223 115.608,84.17 r90 top
U5 "MAX3485" SOIC-8 167.767,141.707 r0 top
U6 "AD7606" LQFP-64 91.186,93.218 r180 top locked
U11 "VP811" SOT-143 132.182,196.761 r270 top
U20 "CH340C" SOP-16 179.514,83.782 r270 top
U21 "ISO7221AD" SOIC-8 163.83,83.82 r270 top
U31 "LT1167" SO-8 28.287,54.434 r180 top
U32 "LT1167" SO-8 49.149,53.34 r180 top
U33 "LT1167" SO-8 70.104,53.848 r180 top
U34 "LT1167" SO-8 92.51,53.926 r180 top
U35 "LT1167" SO-8 115.316,53.467 r180 top
U36 "LT1167" SO-8 138.826,53.916 r180 top
U37 "LT1167" SO-8 161.695,53.042 r180 top
U38 "LT1167" SO-8 183.896,53.545 r180 top
U44 "TJA1057GT3_8P" SOIC-8 135.179,103.099 r0 top
U100 "RTL8211E-VB" QFN-48_L6.0-W6.0-P0.40-BL-EP3.8 167.865,110.451 r90 top
U241 "URA2424S-6WR3" PWRM-TH_7P-L22.0-W9.5-P2.54_TESLA_URA2424S-6WR3 5.461,108.712 r90 top locked
U242 "URA2415S-6WR3" PWRM-TH_7P-L22.0-W9.5-P2.54_TESLA_URA2424S-6WR3 5.588,74.93 r90 top
USBC1 "TYPE-C-31-M-12" USB-C_SMD-TYPE-C-31-M-12_1 195.211,81.096 r90 top
Y7 "25MHz" SMD3225-4P 165.608,99.72 r180 top
Z1 "PESD3V3L1BA" SOD-323 115.126,210.696 r90 top
Z2 "PESD3V3L1BA" SOD-323 137.795,210.972 r90 top
Z3 "PESD3V3L1BA" SOD-323 20.13,212.714 r90 top
Z4 "PESD3V3L1BA" SOD-323 41.726,212.24 r90 top
Z5 "PESD3V3L1BA" SOD-323 84.22,212.282 r90 top
Z6 "PESD3V3L1BA" SOD-323 62.611,212.09 r90 top
? "Comment" M3x14_L 5,5 r90 top locked

## Footprints (in the part's own frame and the unit in brackets; to place one, negate y for a bottom-side part, rotate by r counter-clockwise, add the part's x,y. Pads: shape width x height; smd on the part's side, far side on the other; paste and mask are expansions set on the pad)
2pin [mm]
  round 1.8 hole 0.9: 1(0,1.27) 2(0,-1.27)
  silkscreen extent -1.27,-2.67 1.27,2.54
0603 [mm]
  rect 0.7x0.9 smd: 1(-0.75,0) 2(0.75,0)
  silkscreen extent -0.2,-0.35 0.2,0.35, body extent -0.83,-0.4 0.77,0.4, height 0.4
0603C [mm]
  rect 0.76x0.8 smd: 1(-0.76,0) 2(0.76,0)
  silkscreen extent -1.46,-0.7 1.46,0.7
1210L [mm]
  rect 1.5x2.5 smd: 1(-1.4,0) 2(1.4,0)
  silkscreen extent -2.2,-1.55 2.2,1.55
1812 [mil]
  rect 60x125 smd: 1(-92.5,0) 2(92.5,0)
  silkscreen extent -142,-85 142,85, body extent -87,-64 91,62, height 22
"C 0603_L" [mil] "无极性贴片电容                                       淘宝ID:黄晶宝石"
  rect 30x30 smd: 1(-25.59,0) 2(25.59,0)
  silkscreen extent -51,-26 51,26, body extent -31,-16 31,16, height 32
"C 0805_L" [mil] "无极性贴片电容                                        淘宝ID:黄晶宝石"
  rect 35x50 smd: 1(-37.4,0) 2(37.4,0)
  silkscreen extent -67,-36 67,36, body extent -39,-24 39,24, height 20
CAP-TH_BD8.0-P3.50-D0.6-FD [mm]
  round 1.6 hole 1: 1(-1.75,0) 2(1.75,0)
  silkscreen extent -3.96,-4 4.04,4
CAP-TH_BD10.0-P5.00-D1.0-FD [mm]
  round 1.6 hole 1: 1(-2.54,0) 2(2.54,0)
  silkscreen extent -5,-5 5.08,5
CAP-TH_BD13.0-P5.00-D1.2-FD [mm]
  round 2 hole 1.2: 1(-2.54,0) 2(2.54,0)
  silkscreen extent -6.5,-6.5 6.5,6.5
"CM B(4*5.4)" [mm] "贴片电解电容，直径4mm，高5.4mm          淘宝ID:黄晶宝石"
  rect 2.1x0.8 smd: 1(2.15,0)
  oval 2.1x0.8 smd: 2(-2.15,0)
  silkscreen extent -2.1,-2.1 2.1,2.1, body extent -2.3,-2.12 2.3,2.18, height 5.4
"CM D(6.3*5.4)" [mm] "贴片电解电容，直径6.3mm，高5.4mm           淘宝ID:黄晶宝石"
  rect 2.7x1 smd: 1(3,0)
  oval 2.7x1 smd: 2(-3,0)
  silkscreen extent -3.3,-3.3 3.3,3.3, body extent -3.5,-3.3 3.5,3.3, height 5.4
CONN-SMD_60P-P0.50_SGDBF-05-60P_1 [mm]
  rect 0.25x2 smd paste+0 mask+0.051: 1(16.1,0.2) 2(16.1,4.2) 3(15.6,0.2) 4(15.6,4.2) 5(15.1,0.2) 6(15.1,4.2) 7(14.6,0.2) 8(14.6,4.2) 9(14.1,0.2) 10(14.1,4.2) 11(13.6,0.2) 12(13.6,4.2) 13(13.1,0.2) 14(13.1,4.2) 15(12.6,0.2) 16(12.6,4.2) 17(12.1,0.2) 18(12.1,4.2) 19(11.6,0.2) 20(11.6,4.2) 21(11.1,0.2) 22(11.1,4.2) 23(10.6,0.2) 24(10.6,4.2) 25(10.1,0.2) 26(10.1,4.2) 27(9.6,0.2) 28(9.6,4.2) 29(9.1,0.2) 30(9.1,4.2) 31(8.6,0.2) 32(8.6,4.2) 33(8.1,0.2) 34(8.1,4.2) 35(7.6,0.2) 36(7.6,4.2) 37(7.1,0.2) 38(7.1,4.2) 39(6.6,0.2) 40(6.6,4.2) 41(6.1,0.2) 42(6.1,4.2) 43(5.6,0.2) 44(5.6,4.2) 45(5.1,0.2) 46(5.1,4.2) 47(4.6,0.2) 48(4.6,4.2) 49(4.1,0.2) 50(4.1,4.2) 51(3.6,0.2) 52(3.6,4.2) 53(3.1,0.2) 54(3.1,4.2) 55(2.6,0.2) 56(2.6,4.2) 57(2.1,0.2) 58(2.1,4.2) 59(1.6,0.2) 60(1.6,4.2)
  round 0.4 on Top Overlay: 1(16.15,-1.45)
  round 0.65 hole 0.65 unplated paste-2539.97: ""(0.65,0.95) ""(17.05,0.95)
  silkscreen extent 0,-0.8 17.7,5.2
CONN-SMD_60P-P0.50_SGDBM-05-60P_1 [mm]
  rect 0.25x2 smd paste+0 mask+0.051: 1(16.113,-0.2) 2(16.113,-4.2) 3(15.613,-0.2) 4(15.613,-4.2) 5(15.113,-0.2) 6(15.113,-4.2) 7(14.613,-0.2) 8(14.613,-4.2) 9(14.113,-0.2) 10(14.113,-4.2) 11(13.613,-0.2) 12(13.613,-4.2) 13(13.113,-0.2) 14(13.113,-4.2) 15(12.613,-0.2) 16(12.613,-4.2) 17(12.113,-0.2) 18(12.113,-4.2) 19(11.613,-0.2) 20(11.613,-4.2) 21(11.113,-0.2) 22(11.113,-4.2) 23(10.613,-0.2) 24(10.613,-4.2) 25(10.113,-0.2) 26(10.113,-4.2) 27(9.613,-0.2) 28(9.613,-4.2) 29(9.113,-0.2) 30(9.113,-4.2) 31(8.613,-0.2) 32(8.613,-4.2) 33(8.113,-0.2) 34(8.113,-4.2) 35(7.613,-0.2) 36(7.613,-4.2) 37(7.113,-0.2) 38(7.113,-4.2) 39(6.613,-0.2) 40(6.613,-4.2) 41(6.113,-0.2) 42(6.113,-4.2) 43(5.613,-0.2) 44(5.613,-4.2) 45(5.113,-0.2) 46(5.113,-4.2) 47(4.613,-0.2) 48(4.613,-4.2) 49(4.113,-0.2) 50(4.113,-4.2) 51(3.613,-0.2) 52(3.613,-4.2) 53(3.113,-0.2) 54(3.113,-4.2) 55(2.613,-0.2) 56(2.613,-4.2) 57(2.113,-0.2) 58(2.113,-4.2) 59(1.613,-0.2) 60(1.613,-4.2)
  round 0.4 on Top Overlay: 1(16.163,1.4)
  round 0.65 hole 0.65 unplated paste-2539.97: ""(0.663,-0.95) ""(17.063,-0.95)
  silkscreen extent 0.01,-5.2 17.71,0.8
CONN-TH_2P-P5.08 [mm]
  round 2.2 hole 1.3 paste-2539.97 mask+0.051: 1(-2.54,0) 2(2.54,0)
  silkscreen extent -5.72,-4.1 5.08,4.1
"CSW DIP-1P" [mm] "4.1*9.9*7mm           淘宝ID:黄晶宝石"
  rect 1.7x1.7 hole 0.9: 1(0,-3.81)
  round 1.7 hole 0.9: 2(0,3.81)
  silkscreen extent -2.16,-5.08 2.16,4.95, body extent -2.05,-4.95 2.05,4.95, height 6.65
"CSW DIP-2P" [mm] "6.6*9.9*7mm"
  rect 1.7x1.7 hole 0.9: 1(-1.27,-3.81)
  round 1.7 hole 0.9: 2(1.27,-3.81) 3(1.27,3.81) 4(-1.27,3.81)
  silkscreen extent -3.43,-5.08 3.43,4.95, body extent -3.32,-4.95 3.32,4.95, height 6.65
DC-005 [mm] "5.5*2.1mm，DC30V,2.5A      淘宝ID:黄晶宝石"
  rect 2x4 hole 0.8 slot 3 at 90 deg: 1(-6.2,0) 2(0,0)
  rect 4x2 hole 0.8 slot 2.5 at 0 deg: 3(-3.5,4.7)
  silkscreen extent -5.48,-4.5 7.5,4.5, body extent -6.55,-4.5 7.5,4.8, height 11.2
FUSE-TH_L13.0-W3.1-P5.10-D0.8-S1.40 [mm]
  round 1.8 hole 1.2: 1(-2.55,0.7) 2(2.55,-0.7)
  silkscreen extent -6.5,-1.55 6.5,1.55
HDR2.54-LI-2x3P [mm] "封装库来自淘宝卖家 ID：黄晶宝石"
  rect 1.6x1.6 hole 0.9: 1(-2.54,-1.27)
  round 1.6 hole 0.9: 2(-2.54,1.27) 3(0,-1.27) 4(0,1.27) 5(2.54,-1.27) 6(2.54,1.27)
  silkscreen extent -3.81,-2.54 3.81,2.54, body extent -3.81,-2.54 3.81,2.54, height 8.5
HDR2.54-LI-2x5P [mm] "双排排针，5x2脚 淘宝ID:黄晶宝石   店铺网址:https://shop463601444.taobao.com"
  rect 1.6x1.6 hole 0.9: 1(-5.08,-1.27)
  round 1.6 hole 0.9: 2(-5.08,1.27) 3(-2.54,-1.27) 4(-2.54,1.27) 5(0,-1.27) 6(0,1.27) 7(2.54,-1.27) 8(2.54,1.27) 9(5.08,-1.27) 10(5.08,1.27)
  silkscreen extent -6.35,-2.54 6.35,2.54, body extent -6.35,-2.54 6.35,2.54, height 8.5
HDR2.54-LI-2x20P [mm] "双排排针，20x2脚"
  rect 1.6x1.6 hole 0.9: 1(-24.13,-1.27)
  round 1.6 hole 0.9: 2(-24.13,1.27) 3(-21.59,-1.27) 4(-21.59,1.27) 5(-19.05,-1.27) 6(-19.05,1.27) 7(-16.51,-1.27) 8(-16.51,1.27) 9(-13.97,-1.27) 10(-13.97,1.27) 11(-11.43,-1.27) 12(-11.43,1.27) 13(-8.89,-1.27) 14(-8.89,1.27) 15(-6.35,-1.27) 16(-6.35,1.27) 17(-3.81,-1.27) 18(-3.81,1.27) 19(-1.27,-1.27) 20(-1.27,1.27) 21(1.27,-1.27) 22(1.27,1.27) 23(3.81,-1.27) 24(3.81,1.27) 25(6.35,-1.27) 26(6.35,1.27) 27(8.89,-1.27) 28(8.89,1.27) 29(11.43,-1.27) 30(11.43,1.27) 31(13.97,-1.27) 32(13.97,1.27) 33(16.51,-1.27) 34(16.51,1.27) 35(19.05,-1.27) 36(19.05,1.27) 37(21.59,-1.27) 38(21.59,1.27) 39(24.13,-1.27) 40(24.13,1.27)
  silkscreen extent -25.4,-2.54 25.4,2.54, body extent -25.4,-2.54 25.4,2.54, height 8.5
HDR2.54-Y-LI-2P [mm] "圆孔排母，2脚"
  rect 1.7x1.7 hole 0.9: 1(-1.27,0)
  round 1.7 hole 0.9: 2(1.27,0)
  silkscreen extent -2.67,-1.27 2.67,1.27, body extent -2.54,-1.27 2.54,1.27, height 4.31
HDR2X2_B [mm] "Connector; Header; 2 Position"
  rect 1.5x1.5 hole 0.9: 1(0,0)
  round 1.5 hole 0.9: 2(2.54,0) 3(0,-2.54) 4(2.54,-2.54)
  silkscreen extent -1.27,-3.81 3.81,1.27
IDC2.54-LI-2x12P [mm] "24P简易牛角座"
  rect 1.6x1.6 hole 0.9: 1(0,0)
  round 1.6 hole 0.9: 2(0,2.54) 3(2.54,0) 4(2.54,2.54) 5(5.08,0) 6(5.08,2.54) 7(7.62,0) 8(7.62,2.54) 9(10.16,0) 10(10.16,2.54) 11(12.7,0) 12(12.7,2.54) 13(15.24,0) 14(15.24,2.54) 15(17.78,0) 16(17.78,2.54) 17(20.32,0) 18(20.32,2.54) 19(22.86,0) 20(22.86,2.54) 21(25.4,0) 22(25.4,2.54) 23(27.94,0) 24(27.94,2.54)
  silkscreen extent -5.11,-3.23 33.05,5.77, body extent -5.08,-3.08 33.02,5.77, height 9.17
KF128-5.08-2P [mm] "螺钉式接线端子，脚距5.08mm"
  oval 2.5x3.5 hole 1.2: 1(-2.54,0) 2(2.54,0)
  silkscreen extent -5.59,-5.31 5.08,5.21, body extent -5.58,-5.3 5.08,5.2, height 14.15
"L 0603" [mil] "小功率贴片电感        淘宝ID:黄晶宝石"
  rect 35x35 smd: 1(-35,0) 2(35,0)
  silkscreen extent -65,-25 65,25, body extent -31,-16 31,16, height 31
"L 0805" [mil] "小功率贴片电感        淘宝ID:黄晶宝石"
  rect 40x55 smd: 1(-45,0) 2(45,0)
  silkscreen extent -75,-35 75,35, body extent -39,-24 39,24, height 35
"LED 0805R" [mil] "红色0805LED                                       淘宝ID:黄晶宝石"
  rect 60x50 smd: 1(-50,0)
  oct 60x50 smd: 2(50,0)
  silkscreen extent -90,-35 105,35, body extent -39,-25 39,25, height 32
LQFP-64 [mm] "LQFP"
  oval 2.1x0.3 smd: 1(-5.6,3.75) 2(-5.6,3.25) 3(-5.6,2.75) 4(-5.6,2.25) 5(-5.6,1.75) 6(-5.6,1.25) 7(-5.6,0.75) 8(-5.6,0.25) 9(-5.6,-0.25) 10(-5.6,-0.75) 11(-5.6,-1.25) 12(-5.6,-1.75) 13(-5.6,-2.25) 14(-5.6,-2.75) 15(-5.6,-3.25) 16(-5.6,-3.75) 33(5.6,-3.75) 34(5.6,-3.25) 35(5.6,-2.75) 36(5.6,-2.25) 37(5.6,-1.75) 38(5.6,-1.25) 39(5.6,-0.75) 40(5.6,-0.25) 41(5.6,0.25) 42(5.6,0.75) 43(5.6,1.25) 44(5.6,1.75) 45(5.6,2.25) 46(5.6,2.75) 47(5.6,3.25) 48(5.6,3.75)
  oval 0.3x2.1 smd: 17(-3.75,-5.6) 18(-3.25,-5.6) 19(-2.75,-5.6) 20(-2.25,-5.6) 21(-1.75,-5.6) 22(-1.25,-5.6) 23(-0.75,-5.6) 24(-0.25,-5.6) 25(0.25,-5.6) 26(0.75,-5.6) 27(1.25,-5.6) 28(1.75,-5.6) 29(2.25,-5.6) 30(2.75,-5.6) 31(3.25,-5.6) 32(3.75,-5.6) 49(3.75,5.6) 50(3.25,5.6) 51(2.75,5.6) 52(2.25,5.6) 53(1.75,5.6) 54(1.25,5.6) 55(0.75,5.6) 56(0.25,5.6) 57(-0.25,5.6) 58(-0.75,5.6) 59(-1.25,5.6) 60(-1.75,5.6) 61(-2.25,5.6) 62(-2.75,5.6) 63(-3.25,5.6) 64(-3.75,5.6)
  silkscreen extent -5.72,-4.15 4.15,4.57, body extent -5,-5 5,5, height 1.6
M3x14_L [mm] "M3铜柱，长：14mm"
  round 5.08 hole 3.175: 1(0,0)
  silkscreen extent -4,-4 4,4, body extent -2.7,-2.35 2.7,2.35, height 14.05
PWRM-TH_7P-L22.0-W9.5-P2.54_TESLA_URA2424S-6WR3 [mm]
  round 1.8 hole 1.2: 1(-8.89,0) 2(-6.35,0) 3(-3.81,0) 5(1.27,0) 6(3.81,0) 7(6.35,0) 8(8.89,0)
  silkscreen extent -11,-6.8 11,2.7
QFN-48_L6.0-W6.0-P0.40-BL-EP3.8 [mm]
  rect 0.2x0.665 smd paste-100 mask+0.051: 1(-2.2,-2.908) 2(-1.8,-2.908) 3(-1.4,-2.908) 4(-1,-2.908) 5(-0.6,-2.908) 6(-0.2,-2.908) 7(0.2,-2.908) 8(0.6,-2.908) 9(1,-2.908) 10(1.4,-2.908) 11(1.8,-2.908) 12(2.2,-2.908) 25(2.2,2.908) 26(1.8,2.908) 27(1.4,2.908) 28(1,2.908) 29(0.6,2.908) 30(0.2,2.908) 31(-0.2,2.908) 32(-0.6,2.908) 33(-1,2.908) 34(-1.4,2.908) 35(-1.8,2.908) 36(-2.2,2.908)
  rect 0.665x0.2 smd paste-100 mask+0.051: 13(2.908,-2.2) 14(2.908,-1.8) 15(2.908,-1.4) 16(2.908,-1) 17(2.908,-0.6) 18(2.908,-0.2) 19(2.908,0.2) 20(2.908,0.6) 21(2.908,1) 22(2.908,1.4) 23(2.908,1.8) 24(2.908,2.2) 37(-2.908,2.2) 38(-2.908,1.8) 39(-2.908,1.4) 40(-2.908,1) 41(-2.908,0.6) 42(-2.908,0.2) 43(-2.908,-0.2) 44(-2.908,-0.6) 45(-2.908,-1) 46(-2.908,-1.4) 47(-2.908,-1.8) 48(-2.908,-2.2)
  rect 3.8x3.8 smd paste-100 mask+0.051: 49(0,0)
  silkscreen extent -3.08,-3.61 3.08,3.08
"R 0603_L" [mil] "1/10W贴片电阻                 淘宝ID:黄晶宝石"
  rect 30x30 smd: 1(-25.59,0) 2(25.59,0)
  silkscreen extent -51,-26 51,26, body extent -31,-16 32,16, height 16
"R 0805_L" [mil] "1/8W贴片电阻"
  rect 35x50 smd: 1(-37.4,0) 2(37.4,0)
  silkscreen extent -67,-36 67,36, body extent -39,-25 39,25, height 20
RES-TH_L16.5-W3.5-P7.50-D0.8-S2.10 [mm]
  round 2 hole 1.2: 1(-3.749,1.05) 2(3.749,-1.05)
  silkscreen extent -8.25,-1.78 8.26,1.91
RJ45-TH_10P-P2.54-S2.54_L16.1-W21.4_HY911130A [mil]
  round 61 hole 40: 1(-308.48,377.48) 2(-258.48,277.48) 3(-208.48,377.48) 4(-158.48,277.48) 5(-108.48,377.48) 6(-58.48,277.48) 7(-8.48,377.48) 8(41.52,277.48) 9(91.52,377.48) 10(141.52,277.48)
  round 61 hole 48: 11(-344.11,-165.44) 12(-244.11,-165.44) 13(77.55,-165.44) 14(177.55,-165.44)
  round 101.6 hole 72: 15(-388.2,147.55) 16(221.64,147.55)
  Keep-Out Layer board cut-out: 205.69,27.48 199.36,-0.28 181.6,-22.54 155.95,-34.9 127.48,-34.9 101.83,-22.54 84.07,-0.28 77.74,27.48 77.74,27.48 84.07,55.23 101.83,77.49 127.48,89.85 155.95,89.85 181.6,77.49 199.36,55.23 205.69,27.48
  Keep-Out Layer board cut-out: -244.31,27.48 -250.64,-0.28 -268.4,-22.54 -294.05,-34.9 -322.52,-34.9 -348.17,-22.54 -365.93,-0.28 -372.26,27.48 -372.26,27.48 -365.93,55.23 -348.17,77.49 -322.52,89.85 -294.05,89.85 -268.4,77.49 -250.64,55.23 -244.31,27.48
  Keep-Out Layer circle w1: c141.72,27.48 r63.98
  Keep-Out Layer circle w1: c-308.28,27.48 r63.98
  Keep-Out Layer region: 205.69,27.48 199.36,-0.28 181.6,-22.54 155.95,-34.9 127.48,-34.9 101.83,-22.54 84.07,-0.28 77.74,27.48 77.74,27.48 84.07,55.23 101.83,77.49 127.48,89.85 155.95,89.85 181.6,77.49 199.36,55.23 205.69,27.48
  Keep-Out Layer region: -244.31,27.48 -250.64,-0.28 -268.4,-22.54 -294.05,-34.9 -322.52,-34.9 -348.17,-22.54 -365.93,-0.28 -372.26,27.48 -372.26,27.48 -365.93,55.23 -348.17,77.49 -322.52,89.85 -294.05,89.85 -268.4,77.49 -250.64,55.23 -244.31,27.48
  silkscreen extent -399,-402 237,437
SMA [mm] "4.5x2.6*2.2mm（长宽高，不包括引脚）"
  rect 2.2x1.75 smd: 1(-2.3,0) 2(2.3,0)
  silkscreen extent -2.7,-1.52 3.56,1.52, body extent -2.53,-1.3 2.58,1.3, height 2.15
SMA_L4.4-W2.8-LS5.4-RD [mm]
  rect 2.046x1.62 smd paste+0 mask+0.051: 1(-2.565,0) 2(2.565,0)
  silkscreen extent -3.08,-1.44 2.7,1.44
SMD3225-4P [mm]
  rect 1.4x1.2 smd: 1(-1.27,-1.184) 2(1.27,-1.184) 3(1.27,1.016) 4(-1.27,1.016)
  silkscreen extent -2.72,-2.31 2.5,1.52
"SMG 0.39-4P_A" [mm] "40.2*13*7mm(长宽厚)"
  rect 1.7x1.7 hole 0.8: 1(-6.35,-5.08)
  round 1.7 hole 0.8: 2(-3.81,-5.08) 3(-1.27,-5.08) 4(1.27,-5.08) 5(3.81,-5.08) 6(6.35,-5.08) 7(6.35,5.08) 8(3.81,5.08) 9(1.27,5.08) 10(-1.27,5.08) 11(-3.81,5.08) 12(-6.35,5.08)
  silkscreen extent -20.32,-6.6 20.32,6.6, body extent -20.09,-6.5 20.09,6.5, height 7
SO-8 [mil] "封装库来自淘宝卖家 ID：黄晶宝石"
  rect 80x24 smd: 1(0,0)
  oval 80x24 smd: 2(0,-50) 3(0,-100) 4(0,-150) 5(220,-150) 6(220,-100) 7(220,-50) 8(220,0)
  silkscreen extent 60,-175 160,25
SOD-323 [mm] "1.8x1.3X0.9mm（长宽高，不包括引脚）"
  rect 1x0.8 smd: 1(-1.4,0)
  oct 1x0.8 smd: 2(1.4,0)
  silkscreen extent -2.11,-0.76 2.11,0.76, body extent -1.34,-0.63 1.31,0.67, height 1
SOIC-8 [mil]
  oval 88x24 smd: 1(0,0) 2(0,-50) 3(0,-100) 4(0,-150) 5(320,-150) 6(320,-100) 7(320,-50) 8(320,0)
  silkscreen extent 60,-180 260,30, body extent -5,-181 325,31, height 91
SOP-16 [mil] "淘宝ID:黄晶宝石"
  oval 80x24 smd: 1(0,0) 2(0,-50) 3(0,-100) 4(0,-150) 5(0,-200) 6(0,-250) 7(0,-300) 8(0,-350) 9(238.5,-350) 10(238.5,-300) 11(238.5,-250) 12(238.5,-200) 13(238.5,-150) 14(238.5,-100) 15(238.5,-50) 16(238.5,0)
  silkscreen extent 44,-375 194,25
SOT23-3N [mm] "3x1.3x1mm(长宽高)    封装库来自淘宝卖家 ID：黄晶宝石"
  rect 0.5x1.2 smd: 1(-0.95,-1.143) 2(0.95,-1.143) 3(0,1.143)
  silkscreen extent -1.73,-1.78 1.5,0.7, body extent -1.5,-1.2 1.5,1.2, height 1.05
SOT-23-6 [mm] "淘宝ID:黄晶宝石"
  rect 0.6x0.5 smd: 1(0,0) 2(0,-0.95) 3(0,-1.9) 4(2.5,-1.9) 5(2.5,-0.95) 6(2.5,0)
  silkscreen extent 0.63,-2.38 1.87,0.48
SOT-143 [mil]
  rect 40x50 smd: 1(-32.5,-50)
  rect 30x50 smd: 2(37.5,-50) 3(37.5,50) 4(-37.5,50)
SOT-223 [mil] "封装库来自淘宝卖家 ID：黄晶宝石"
  rect 59x79 smd: 1(-88,-130) 2(2.55,-130) 3(93.1,-130)
  rect 150x79 smd: 2(1.88,123.54)
  silkscreen extent -137,-78 143,72, body extent -126,-139 130,135, height 67
SW-TH_2MS1T2B2VS2QES [mm]
  round 1.8 hole 1.15: 1(0,-2.54) 2(0,0) 3(0,2.54) 4(0,5.08) 5(0,-5.08)
  silkscreen extent -2.54,-5.08 2.54,5.08
TEST [mm]
  round 2 hole 1: 1(0,0)
  silkscreen extent -1.25,-1.25 1.25,1.25, body extent -1.27,-1.32 1.27,1.32, height 4.36
"TSW SMD-6*6*4.3" [mm] "6*6*4.3mm"
  rect 2.7x1 smd: 1(-4.4,2.261)
  oval 2.7x1 smd: 2(-4.4,-2.239) 3(4.4,-2.239) 4(4.4,2.261)
  silkscreen extent -2.79,-2.79 2.79,2.79, body extent -4.5,-3 4.5,3, height 4.25
USB-C_SMD-TYPE-C-31-M-12_1 [mm]
  oval 1.2x2 hole 0.8 slot 1.6 at 90 deg: 1(5.513,2.736) 4(-3.137,2.736)
  oval 1.2x1.8 hole 0.8 slot 1.4 at 90 deg: 2(5.513,-1.444) 3(-3.137,-1.444)
  round 0.12 smd: A1B12(-2.012,3.504) A4B9(-1.212,3.504)
  rect 0.3x1.3 smd paste-100 mask+0.051: A5(-0.062,3.504) A6(0.938,3.504) A7(1.438,3.504) A8(2.438,3.504) B5(2.938,3.504) B6(1.938,3.504) B7(0.438,3.504) B8(-0.562,3.504)
  rect 0.6x1.3 smd paste-100 mask+0.051: B1A12(4.388,3.504) B4A9(3.588,3.504)
  Top Layer region: -1.712,2.854 -2.012,2.854 -2.312,2.854 -2.312,4.154 -2.012,4.154 -1.712,4.154
  Top Layer region: -0.912,2.854 -1.212,2.854 -1.512,2.854 -1.512,4.154 -1.212,4.154 -0.912,4.154
  Keep-Out Layer board cut-out: 4.463,2.236 4.426,2.073 4.322,1.943 4.171,1.87 4.004,1.87 3.854,1.943 3.75,2.073 3.713,2.236 3.713,2.236 3.75,2.398 3.854,2.529 4.004,2.601 4.171,2.601 4.322,2.529 4.426,2.398 4.463,2.236
  Keep-Out Layer board cut-out: -1.337,2.236 -1.374,2.073 -1.478,1.943 -1.629,1.87 -1.795,1.87 -1.946,1.943 -2.05,2.073 -2.087,2.236 -2.087,2.236 -2.05,2.398 -1.946,2.529 -1.795,2.601 -1.629,2.601 -1.478,2.529 -1.374,2.398 -1.337,2.236
  Keep-Out Layer circle w0.025: c4.088,2.236 r0.375
  Keep-Out Layer circle w0.025: c-1.712,2.236 r0.375
  Keep-Out Layer region: 4.463,2.236 4.426,2.073 4.322,1.943 4.171,1.87 4.004,1.87 3.854,1.943 3.75,2.073 3.713,2.236 3.713,2.236 3.75,2.398 3.854,2.529 4.004,2.601 4.171,2.601 4.322,2.529 4.426,2.398 4.463,2.236
  Keep-Out Layer region: -1.337,2.236 -1.374,2.073 -1.478,1.943 -1.629,1.87 -1.795,1.87 -1.946,1.943 -2.05,2.073 -2.087,2.236 -2.087,2.236 -2.05,2.398 -1.946,2.529 -1.795,2.601 -1.629,2.601 -1.478,2.529 -1.374,2.398 -1.337,2.236
  silkscreen extent -3.28,-4.06 5.66,1.52

## Part data
7 8 9 10 11 12 13 21 22 23 31 32 33 41 42 43 51 52 53 61 62 63 71 72 73 81 82 83 +1 +2 -4 -5: library part TEST-POINT, "测试点"
C1 C2 CE1 CE2: library part CE_SMD, "贴片电解电容", BOM名称=贴片电解电容, 版权归属="封装库来自淘宝 ID：黄晶宝石", 联系售后=https://shop463601444.taobao.com
C3 C4 C5 C6 C7 C8 C9 C10 C11 C12 C13 C14 C15 C16 C17 C18 C19 C20 C21 C22 C23 C24 C25 C26 C27 C28 C29 C30 C31 C32 C33 C34 C35 C36 C37 C38 C39 C40 C41 C42 C52 C53 C54 C55 C64 C65 C78 C79 C80 C81 C82 C83 C84 C113 C114 C146 C147 C148 C151 C152 C153 C154 C155 C156 C157 C158 C201 C202 C203 C204 C205 C206 C207 C208 C209 C210 C211 C212 C213 C214 C215 C216 C217 C218 C219 C220 C221 C222 C223 C224 C225 C226 C227 C228 C229 C230 C231 C232 C341 C342 C343 C344 C345 C346 C347 C348: library part C, "贴片电容", BOM名称=无极性贴片电容, 唯一出售店铺网址=https://shop463601444.taobao.com, 淘宝ID="封装库来自淘宝 ID：黄晶宝石", 联系售后，技术支持=https://shop463601444.taobao.com
C241 C243 C264 C265 C270 C271: library part CAP
C242 C244 C261 C262 C263 C266 C267 C268 C269 C272: library part C, "无极性贴片电容", BOM名称=无极性贴片电容, 学习资源=www.ooocke.com, 版权归属=源创客
CON2 J1 J3 J4: library part "Header 2", "2P接插件", BOM名称=2P接插件
  CON2: 学习资源=https://shop463601444.taobao.com, 版权归属="封装库来自淘宝卖家 ID：黄晶宝石"
  J1 J3 J4: 技术支持，联系售后="封装库来自淘宝卖家 ID：黄晶宝石", 版权归属="封装库来自淘宝 ID：黄晶宝石", 联系售后=https://shop463601444.taobao.com
D1 LED1: "发光二极管", 技术支持，联系售后=https://shop463601444.taobao.com
D2 Z1 Z2 Z3 Z4 Z5 Z6: library part "DIODE BI-DIR TRIG"
D241: library part BZT52C24_C571382, BOM_JLCPCB Part Class="Extended Part", BOM_Manufacturer="High Diode", BOM_Manufacturer Part=BZT52C24, BOM_Supplier=LCSC, BOM_Supplier Part=C571382, Contributor=LCSC, spicePre=D, spiceSymbolName=BZT52C24_C571382
F1: library part FUSE
F241: BOM_JLCPCB Part Class="Extended Part", BOM_Manufacturer="TLC Electronic", BOM_Manufacturer Part=TRB300, BOM_Supplier=LCSC, BOM_Supplier Part=C262070, Contributor=LCSC, spicePre=F, spiceSymbolName=TRB300
J16: library part 2X5PIN
J17: library part "Header 12X2", "12*2P接插件", BOM名称=12*2P接插件, 学习资源=https://shop463601444.taobao.com, 版权归属="封装库来自淘宝卖家 ID：黄晶宝石"
J26 J27 J28 J29: library part 2X30PIN
JP23: library part "Header 3X2", "3*2P接插件", BOM名称=3*2P接插件, 学习资源=https://shop463601444.taobao.com, 版权归属="封装库来自淘宝 ID：黄晶宝石"
L1 L2 L3 L4 L5 L6: library part L, "小功率贴片电感", BOM名称=小功率贴片电感, 封装库来自淘宝卖家 ID：黄晶宝石=其他店铺购入均为盗版，不享受售后技术支持服务，请立即申请退款, 淘宝ID="封装库来自淘宝 ID：黄晶宝石", 联系售后=https://shop463601444.taobao.com
L242 L243: library part Inductor, "Inductor", Code_IEC=1005, Code_JEITA=0402, LatestRevisionDate=29-May-2009, LatestRevisionNote="IPC-7351 Footprint Added.", PackageDescription="Chip Inductor", PackageReference=0402-A, Published=8-Jun-2000, Publisher="Altium Limited"
P241: library part "Header 2", "Header, 2-Pin", LatestRevisionDate=17-Jul-2002, LatestRevisionNote="Re-released for DXP Platform.", Publisher="Altium Limited"
Q1 Q2 Q3 Q4: library part 9015-SMD, "低噪放大-PNP型", BOM名称=低噪放大-PNP型, 属性="50V 0.1A 0.4W 150MHZ", 技术支持，联系售后=https://shop463601444.taobao.com, 版权归属="封装库来自淘宝 ID：黄晶宝石"
R1 R2 R3 R4 R5 R6 R7 R8 R9 R10 R11 R12 R13 R14 R15 R16 R17 R18 R19 R20 R21 R22 R23 R24 R25 R26 R27 R28 R29 R30 R31 R32 R33 R34 R44 R45 R46 R47 R48 R51 R52 R55 R57 R59 R60 R61 R63 R64 R65 R74 R92 R93 R94 R95 R96 R97 R98 R99 R102 R103 R104 R105 R106 R107 R108 R109 R110 R111 R112 R113 R116 R182 R183 R184 R185 R188 R189 R201 R202 R203 R204 R205 R206 R207 R208 R211 R212 R213 R214 R215 R216 R217 R218 R221 R222 R223 R224 R225 R226 R227 R228 Rg1 Rg2 Rg3 Rg4 Rg5 Rg6 Rg7 Rg8: library part R, "贴片电阻", BOM名称=贴片电阻, 封装库来自淘宝卖家 ID：黄晶宝石=其他店铺购入均为盗版，不享受售后技术支持服务，请立即申请退款, 版权归属="来自淘宝 ID：黄晶宝石", 联系售后=https://shop463601444.taobao.com
R241: BOM_JLCPCB Part Class="Extended Part", BOM_Manufacturer=COV, BOM_Manufacturer Part=14D560K, BOM_Supplier=LCSC, BOM_Supplier Part=C317812, Contributor=LCSC, spicePre=R, spiceSymbolName=14D560K_C317812
SMG1: "0.36寸4位共阳数码管", BOM名称=0.36寸4位共阳, 学习资源=https://shop463601444.taobao.com, 版权归属="封装库来自淘宝卖家 ID：黄晶宝石"
SW1: "1路编码开关", BOM名称=1路编码开关, 学习资源="封装库来自淘宝 ID：黄晶宝石", 技术支持，联系售后=https://shop463601444.taobao.com
SW2: library part "TSW SMD-6x6", "SW2", BOM名称=贴片6x6轻触开关, 唯一出售店铺网址=https://shop463601444.taobao.com, 版权归属="封装库来自淘宝 ID：黄晶宝石"
SW3 SW6 SW7 SW8: library part "TSW SMD-6x6", BOM名称=贴片6x6轻触开关, 唯一出售店铺网址=https://shop463601444.taobao.com, 版权归属="封装库来自淘宝 ID：黄晶宝石"
SW4: library part "TSW SMD-6x6", "SW_PB_ESW", BOM名称=贴片6x6轻触开关, 唯一出售店铺网址=https://shop463601444.taobao.com, 版权归属="封装库来自淘宝 ID：黄晶宝石"
SW5: library part "TSW SMD-6x6", "SW5", BOM名称=贴片6x6轻触开关, 唯一出售店铺网址=https://shop463601444.taobao.com, 版权归属="封装库来自淘宝 ID：黄晶宝石"
SW241: BOM_JLCPCB Part Class="Extended Part", BOM_Manufacturer=Dailywell, BOM_Manufacturer Part=2MS1T2B2VS2QES, BOM_Supplier=LCSC, BOM_Supplier Part=C545202, Contributor=LCSC, spicePre=S, spiceSymbolName=2MS1T2B2VS2QES
U5: library part TJA1057GT3, CLASS=IC
U31 U32 U33 U34 U35 U36 U37 U38: library part AD620BR, "CI-AD620BR"
U241: BOM_Manufacturer=清远特斯拉(TESL*A), BOM_Manufacturer Part=URA2424S-6WR3, BOM_Supplier=LCSC, BOM_Supplier Part=C917733, Contributor=LCSC, spicePre=U, spiceSymbolName=URA2424S-6WR3
U242: library part URA2424S-6WR3, BOM_Manufacturer=清远特斯拉(TESL*A), BOM_Manufacturer Part=URA2424S-6WR3, BOM_Supplier=LCSC, BOM_Supplier Part=C917733, Contributor=LCSC, spicePre=U, spiceSymbolName=URA2424S-6WR3
USBC1: Current Rating-Power=5A, JLCPCB Part Class="Extended Part", LCSC Part Name="Type-C 母", Manufacturer=韩国韩荣, Operating Temperature=-, Add into BOM=yes, Connector Type=Type-C, Convert to PCB=yes, Datasheet=https://item.szlcsc.com/datasheet/TYPE-C-31-M-12/177331.html, Device=TYPE-C-31-M-12, Gender=母, Manufacturer Part=TYPE-C-31-M-12, Mounting Type=-, Number of Contacts=16P, Number of Ports=1, Protocol Standard=-, Supplier=LCSC, Supplier Footprint=SMD, Supplier Part=C165948, Symbol=TYPE-C-31-M-12
Y7: library part CRYSTAL_4P, CLASS=IC
U44: CLASS=IC

## Free pads (board coordinates)
  round 0.4 on Top Overlay: 1(97.128,127.239) 1(97.128,166.489) 1(121.128,127.239) 1(121.128,166.489)

## Via types
v1: diameter 0.508, hole 0.305, Top Layer to Bottom Layer, tented both sides, 558 vias
v2: diameter 0.635, hole 0.305, Top Layer to Bottom Layer, tented both sides, 7 vias